# Altium PCB PCB.PcbDoc (part 1 of 5)
Units mm, origin at the board's own origin, x right, y up, seen from the top; angles counter-clockwise.
Board outline 101.6 x 53.34 mm, 6 copper layers (Top Layer, Int1 (GND), Int2, Int3, Int4 (GND), Bottom Layer), stack 1.625 mm thick; 228 components, 228 nets, 1016 pads, 995 vias.
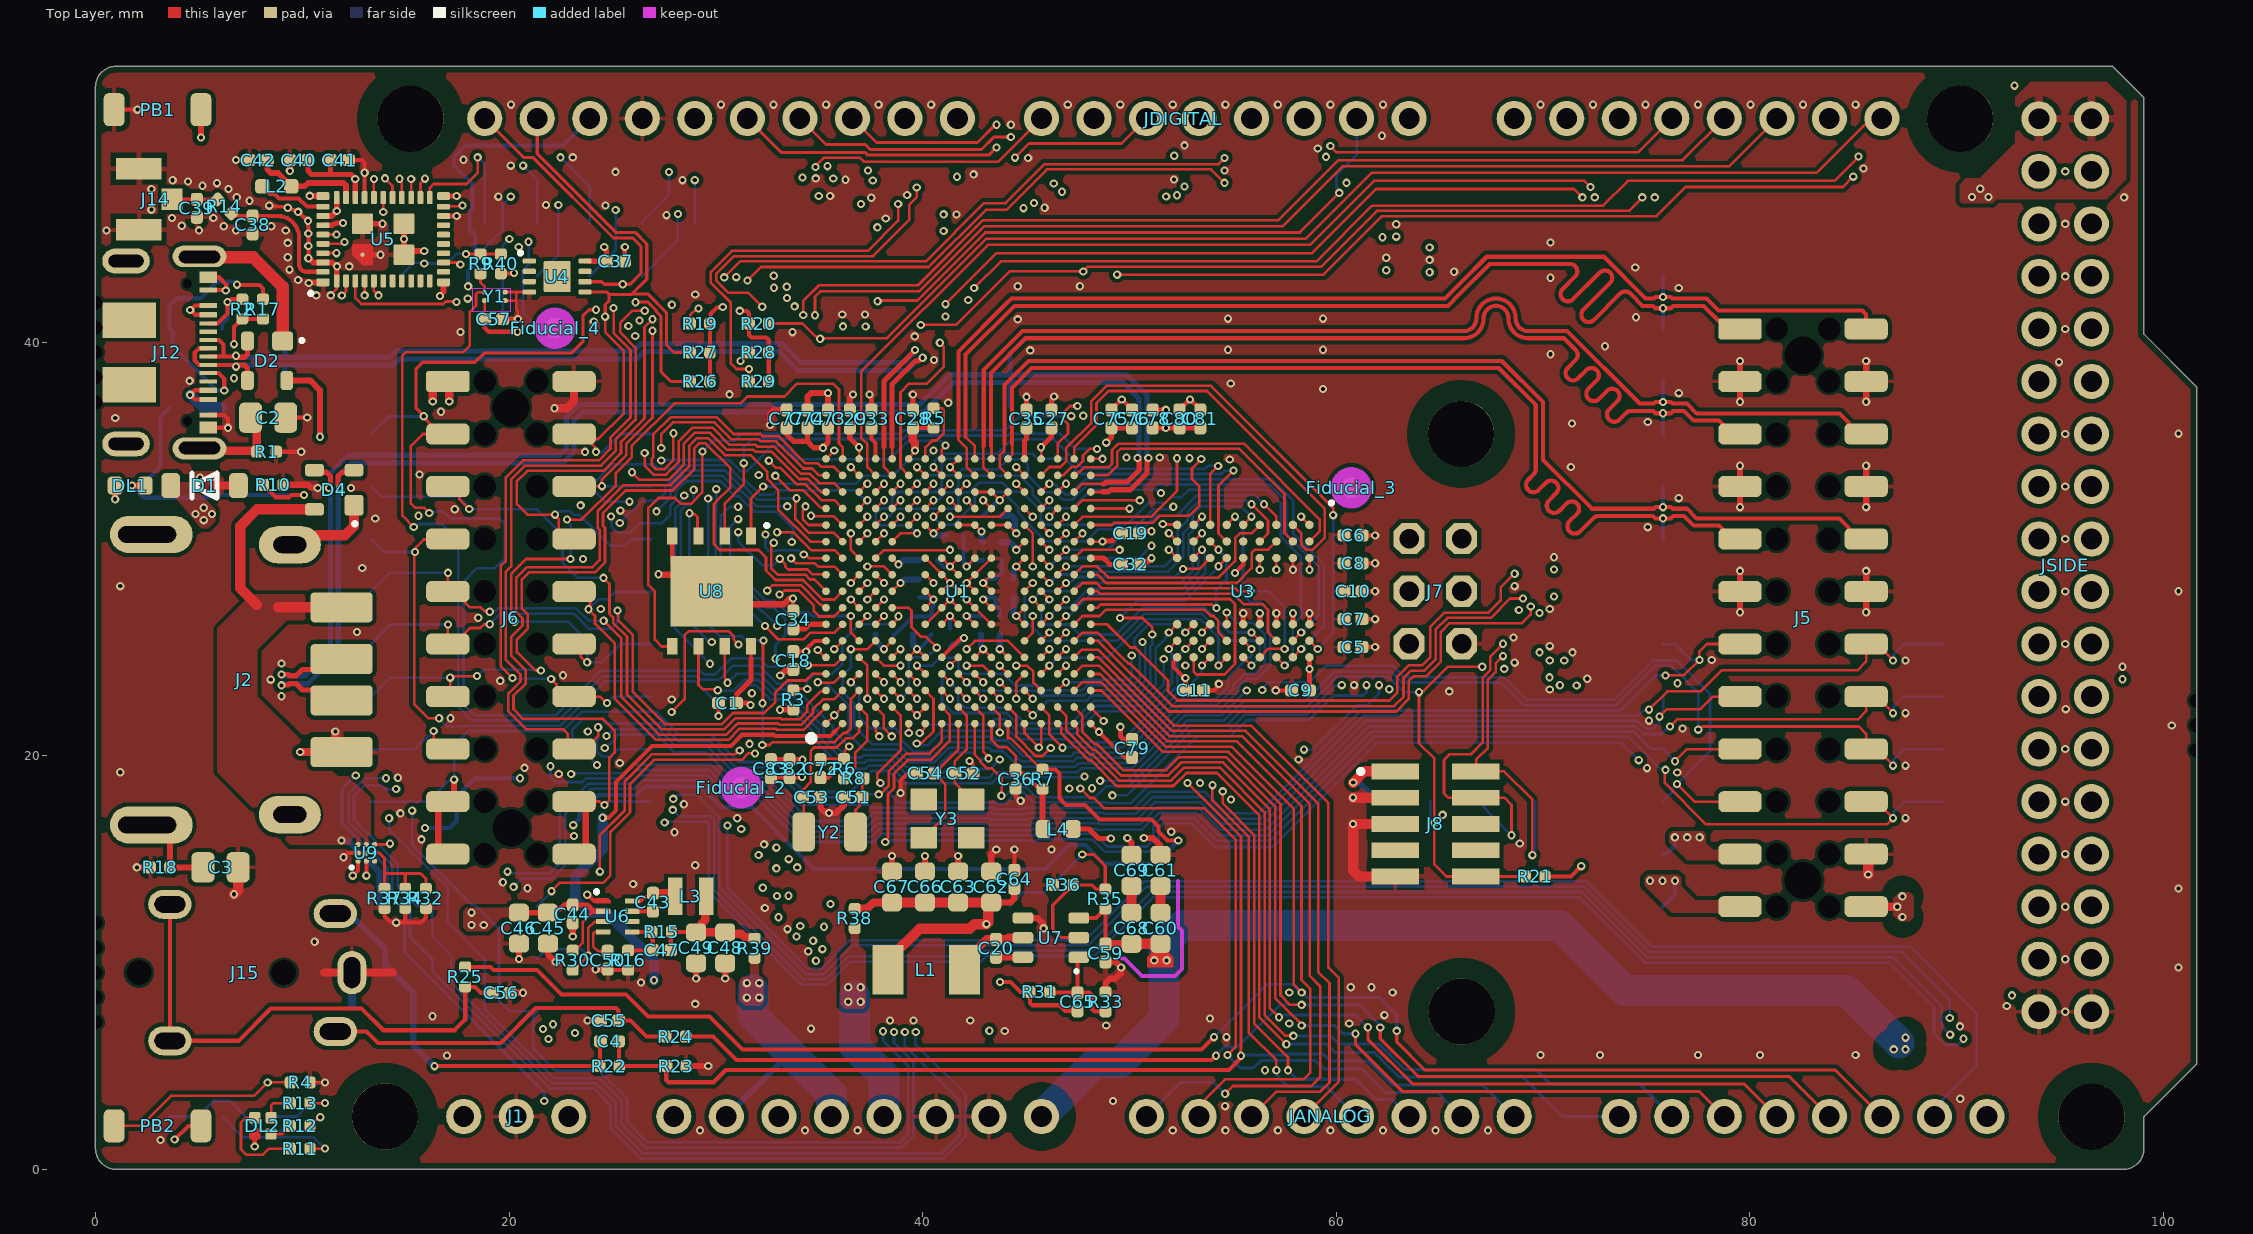
[diagram p0: Top Layer view]
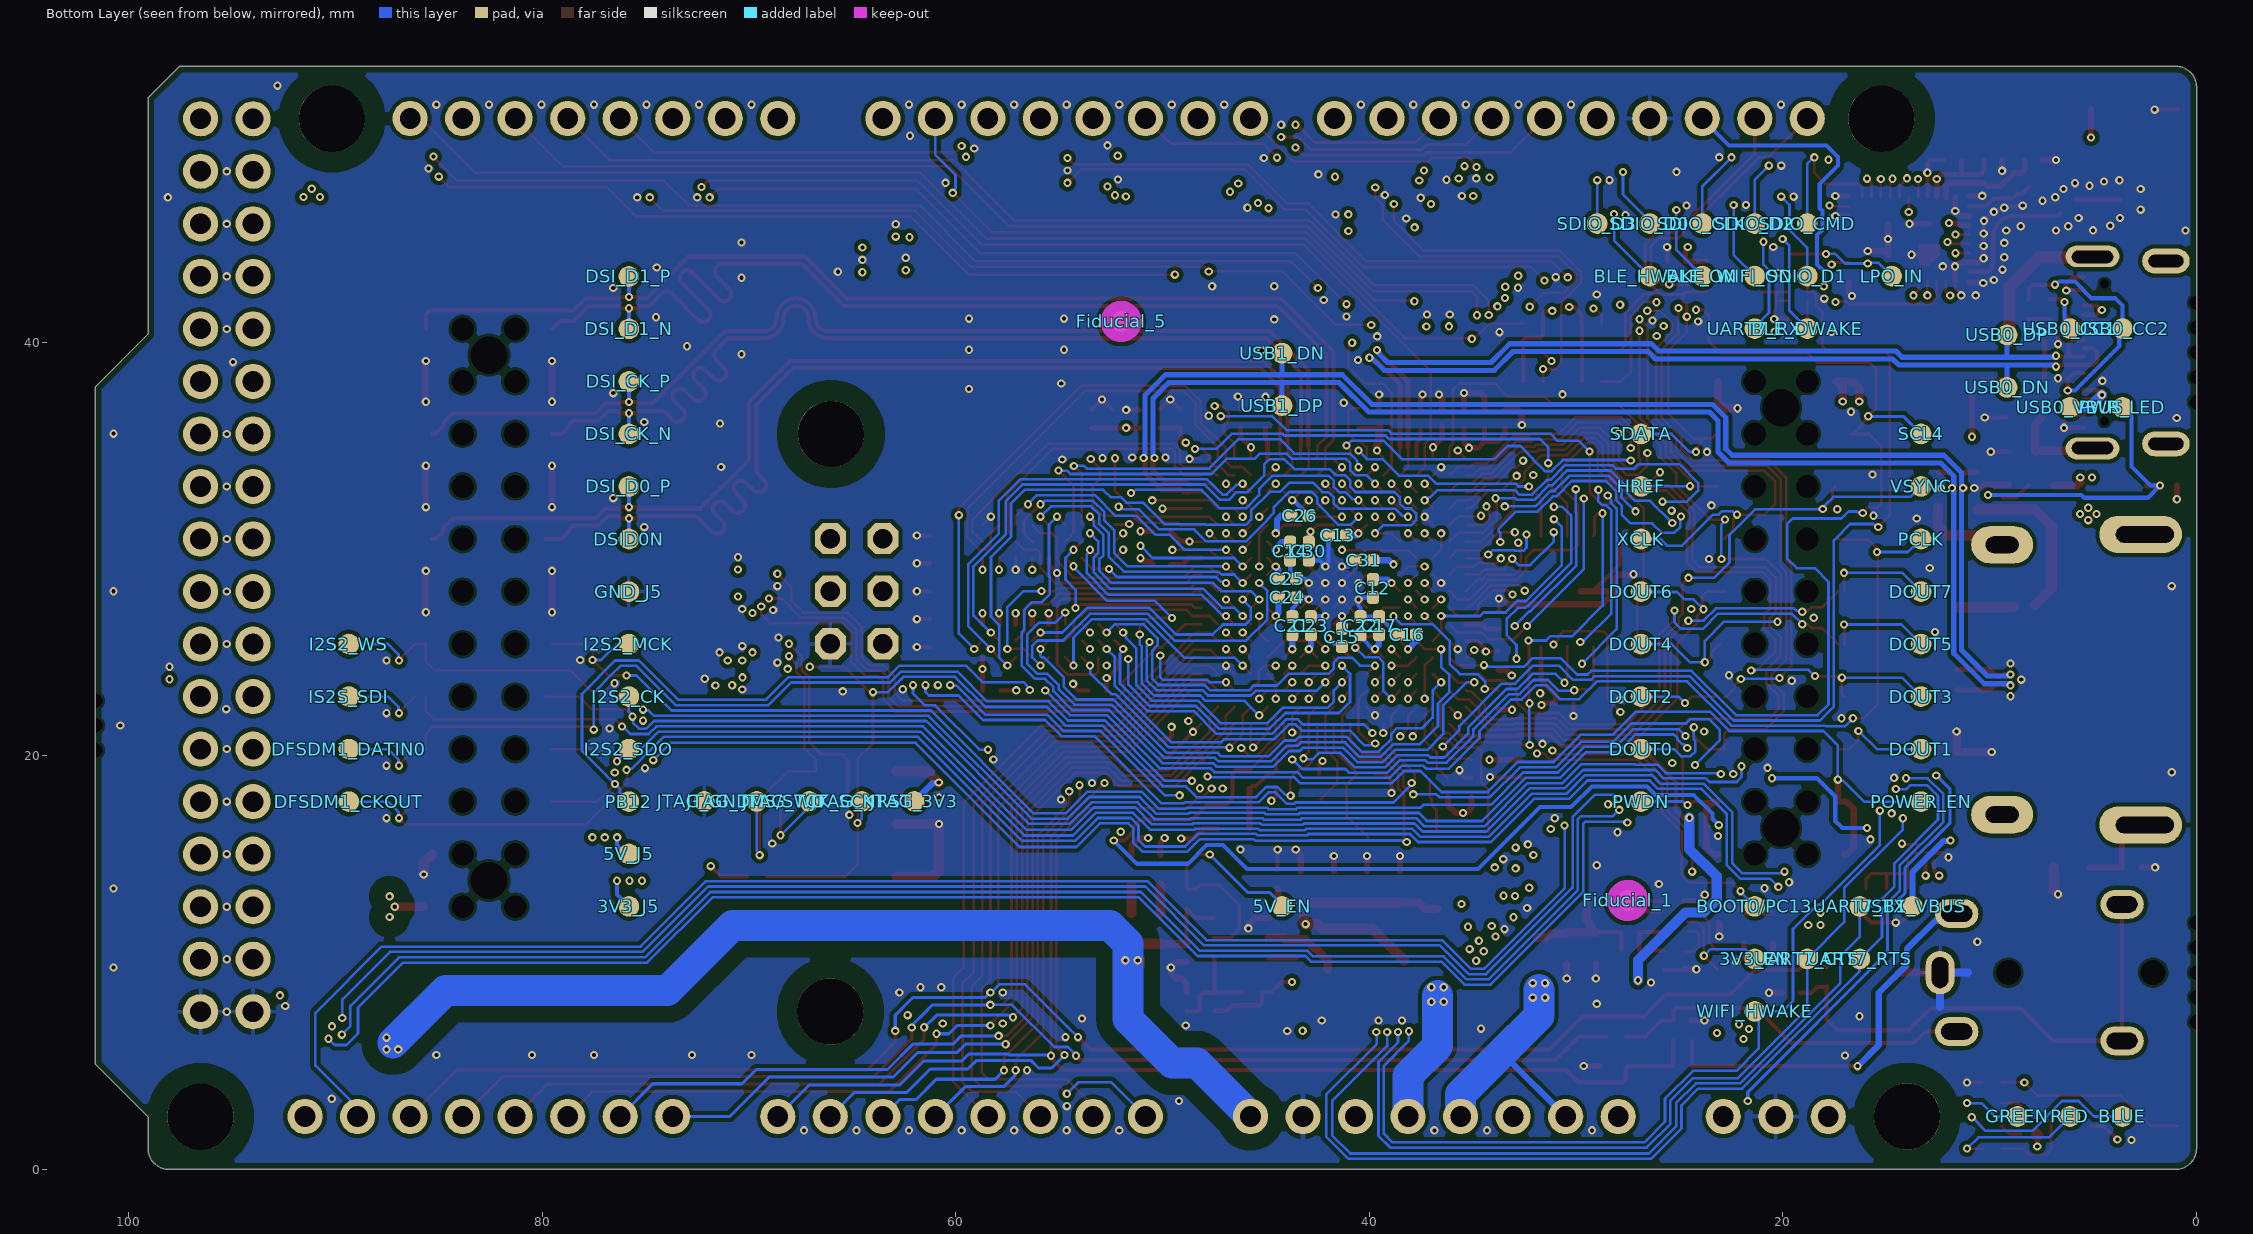
[diagram p1: Bottom Layer view, seen from below]
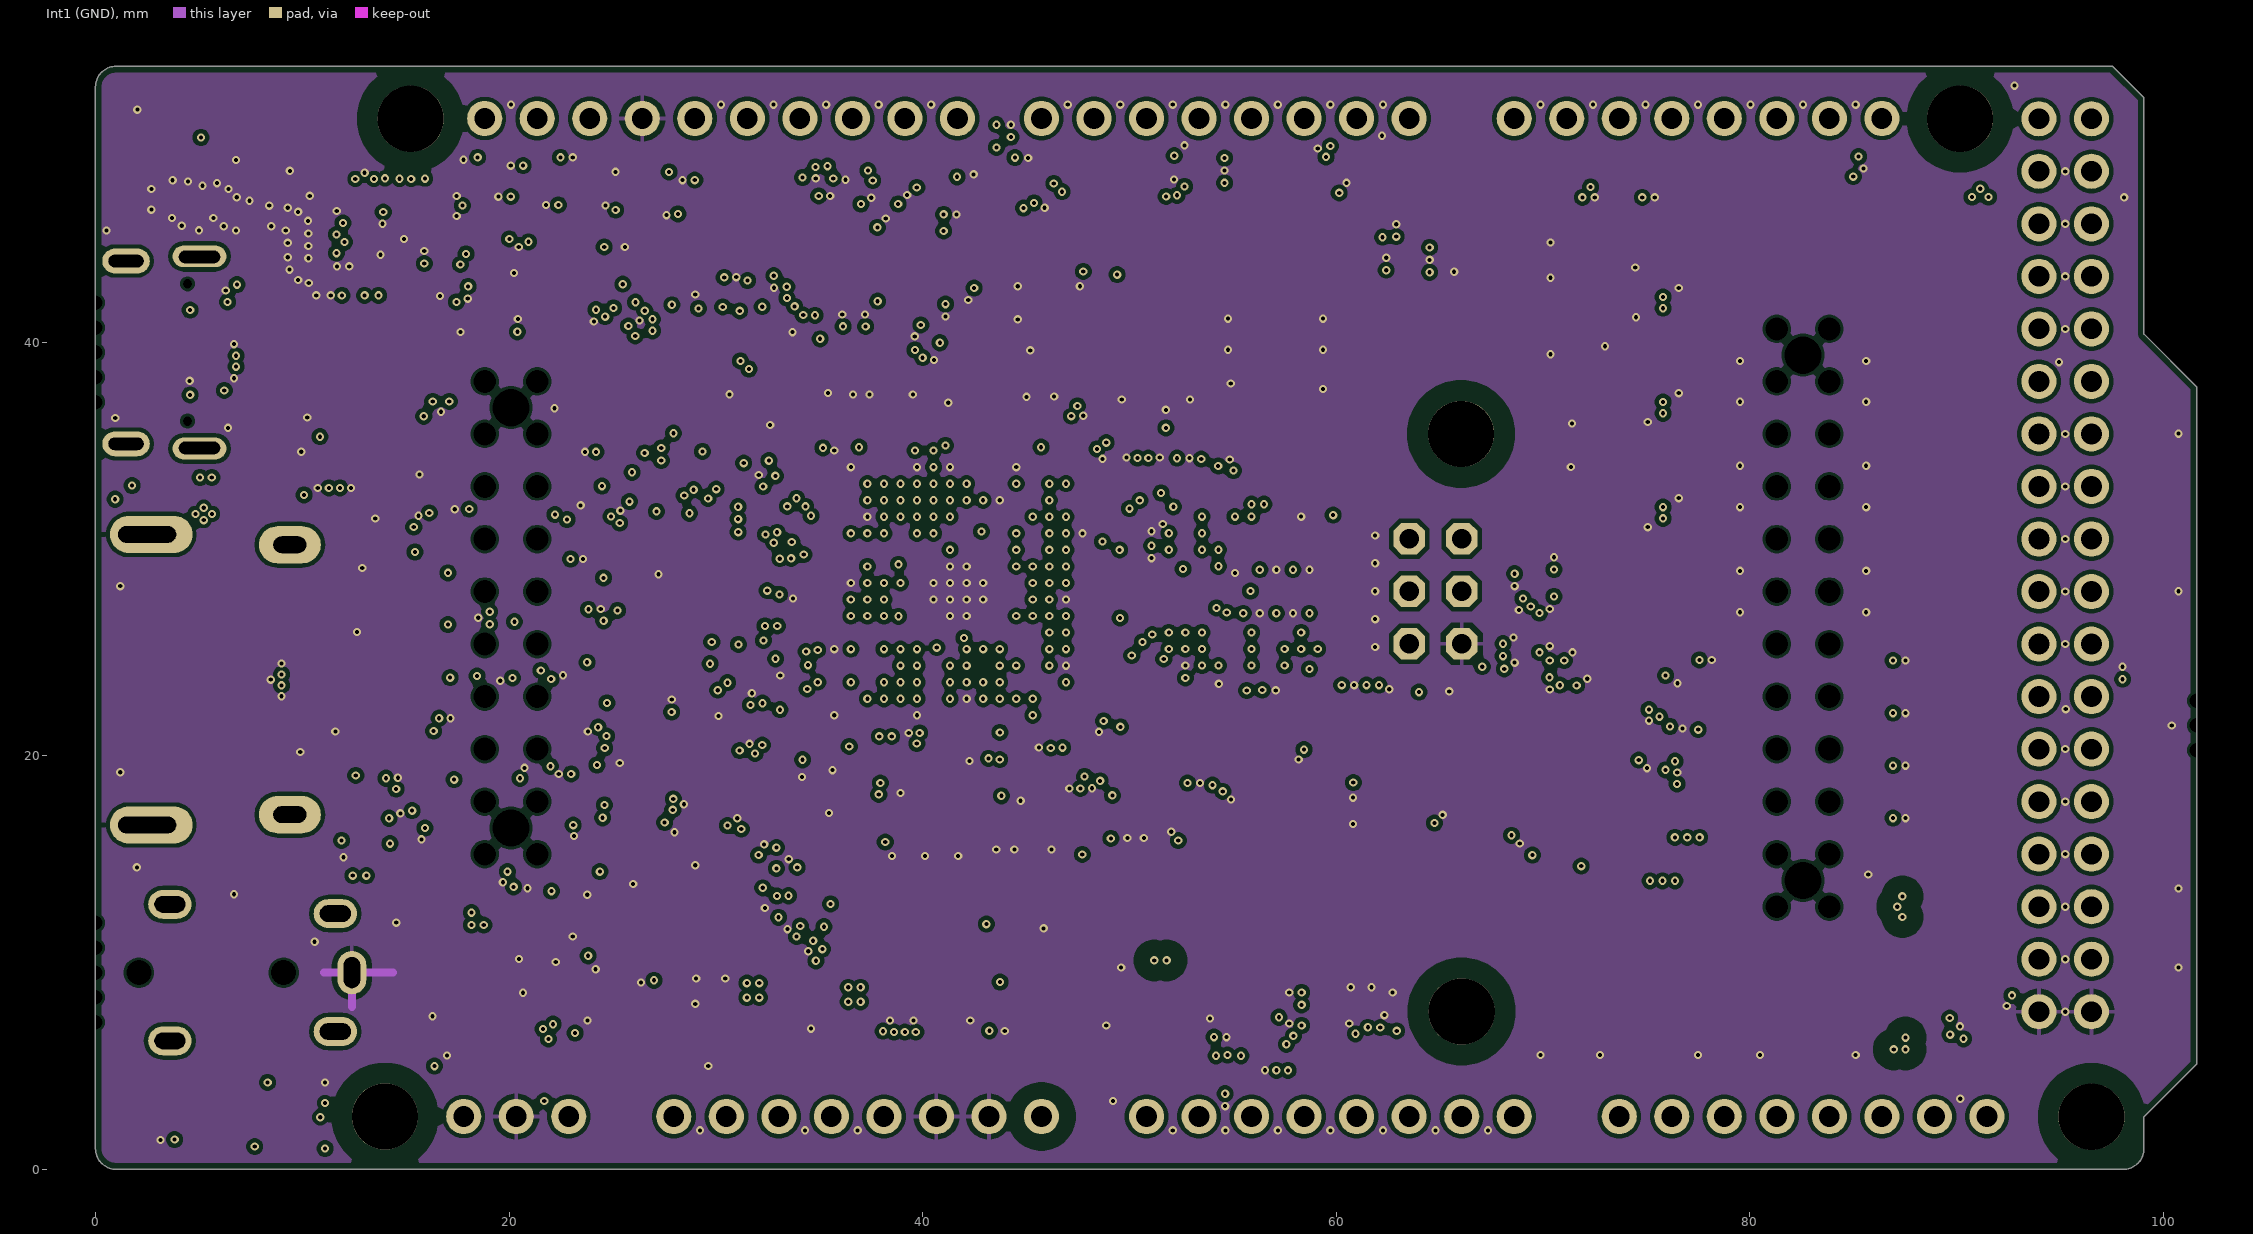
[diagram p2: Int1 (GND)]
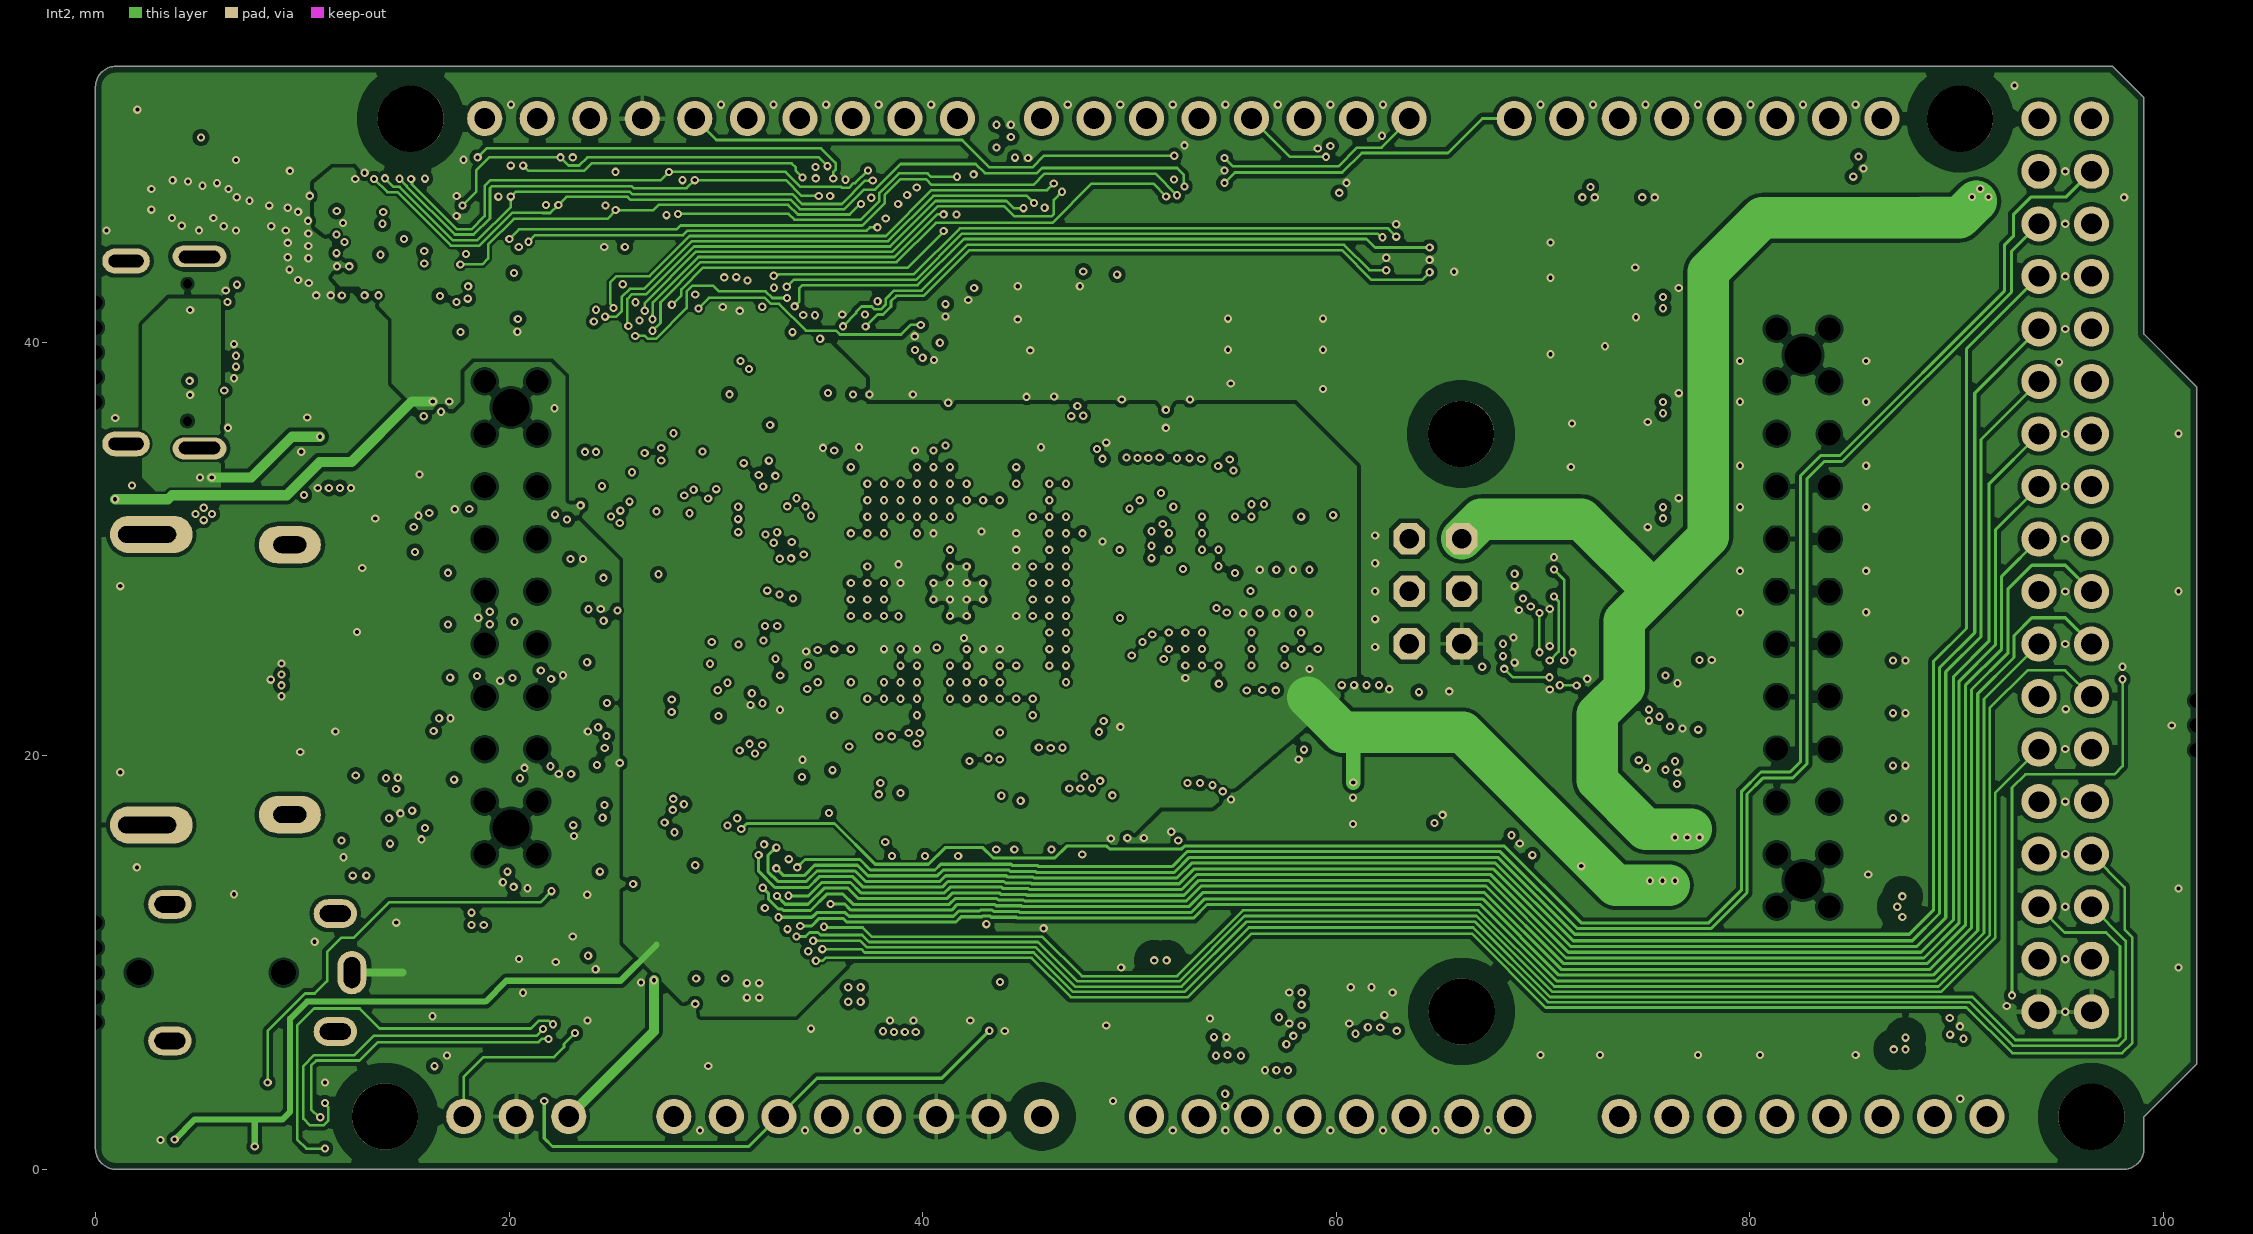
[diagram p3: Int2]
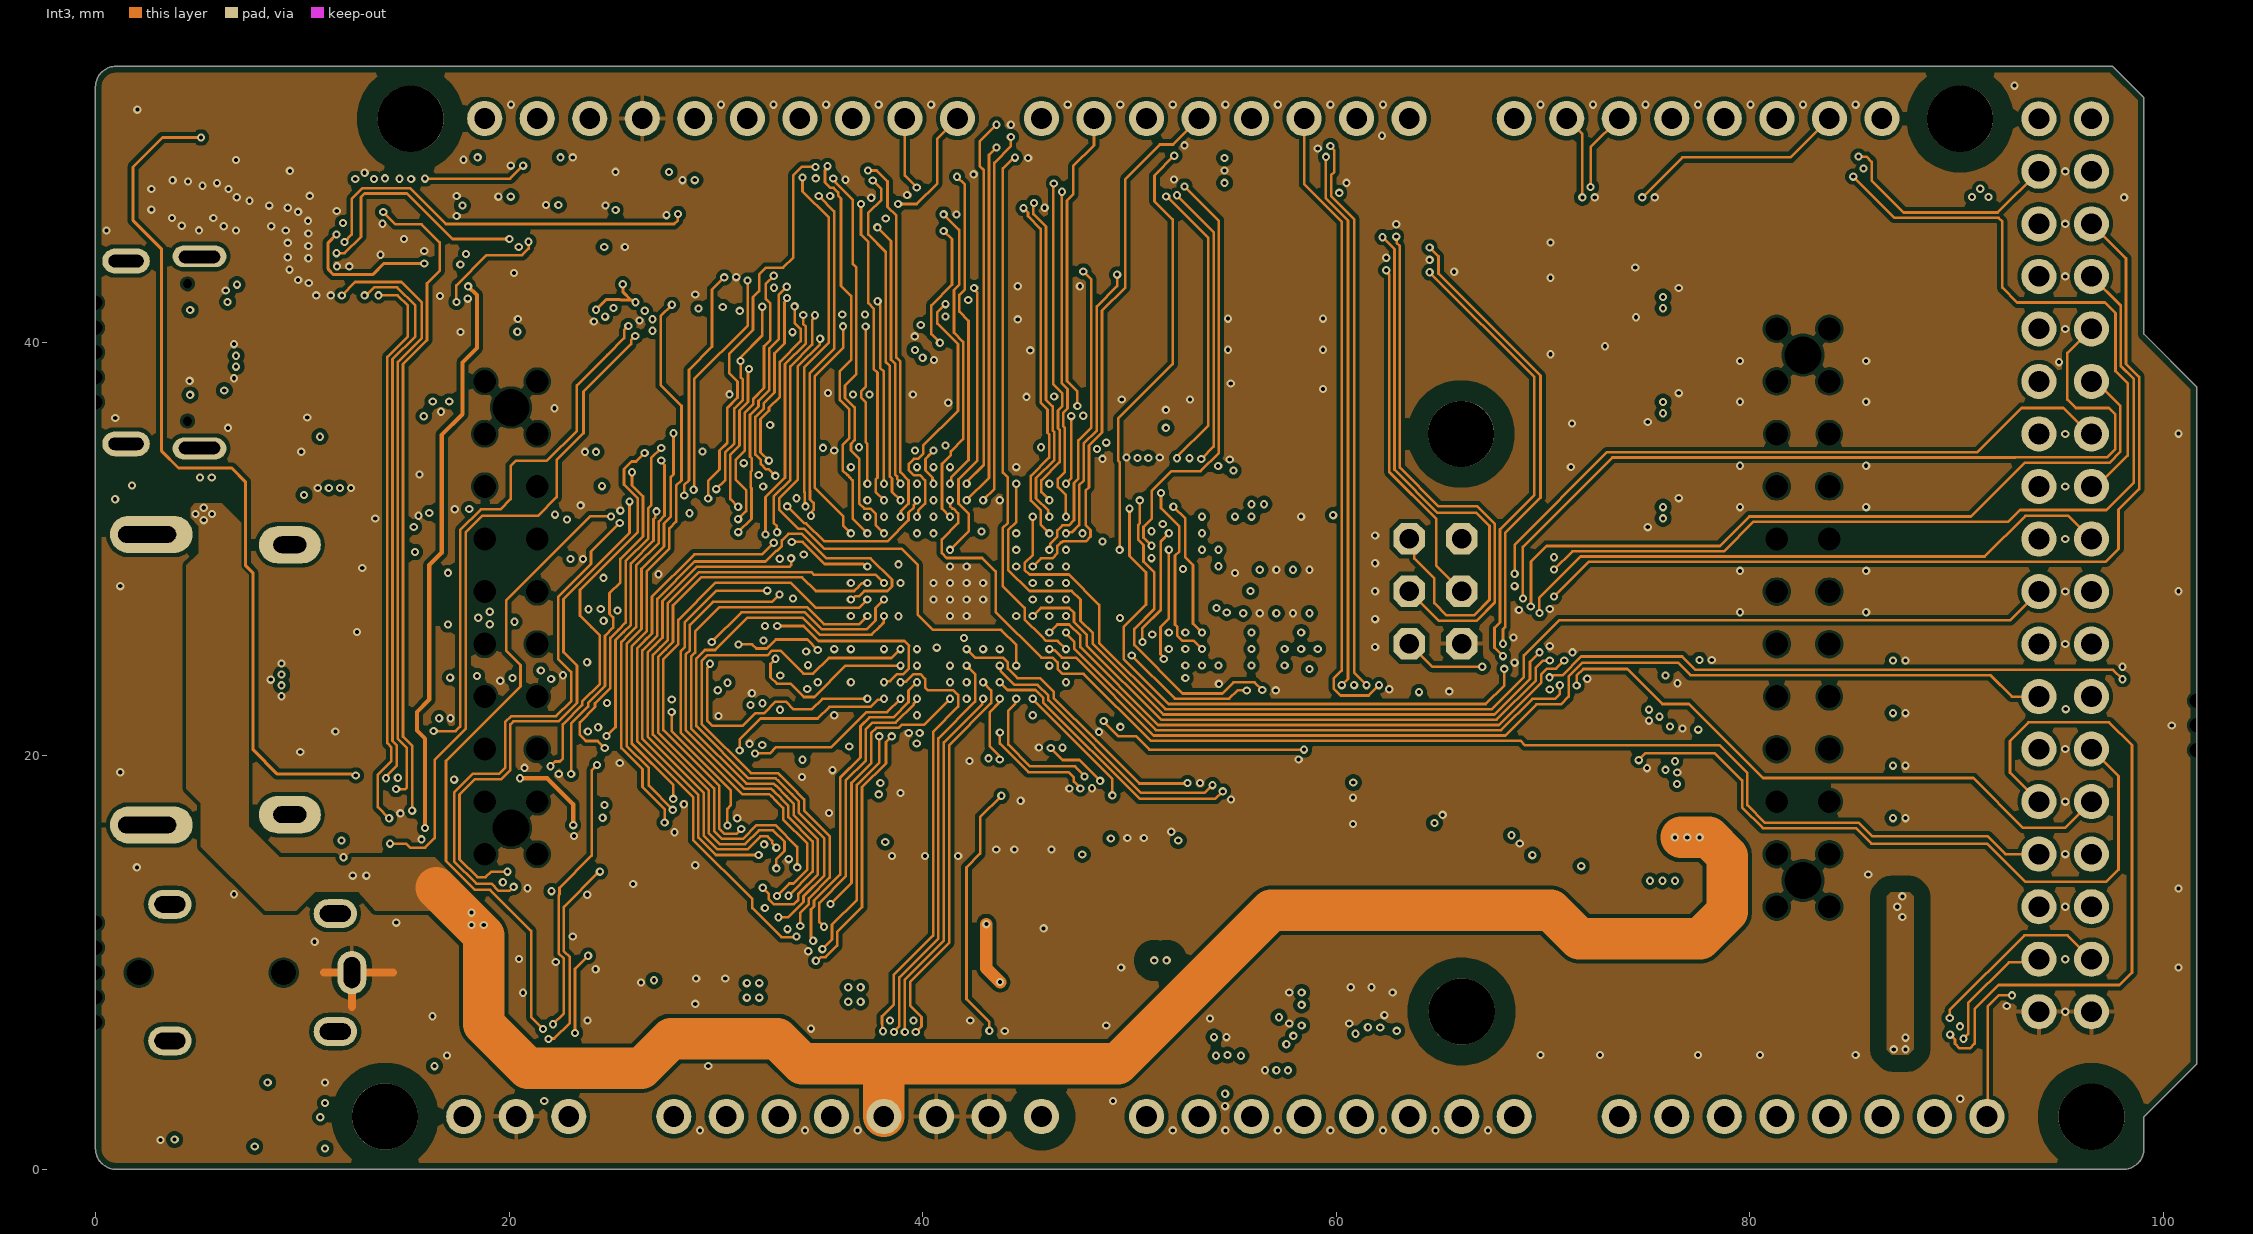
[diagram p4: Int3]
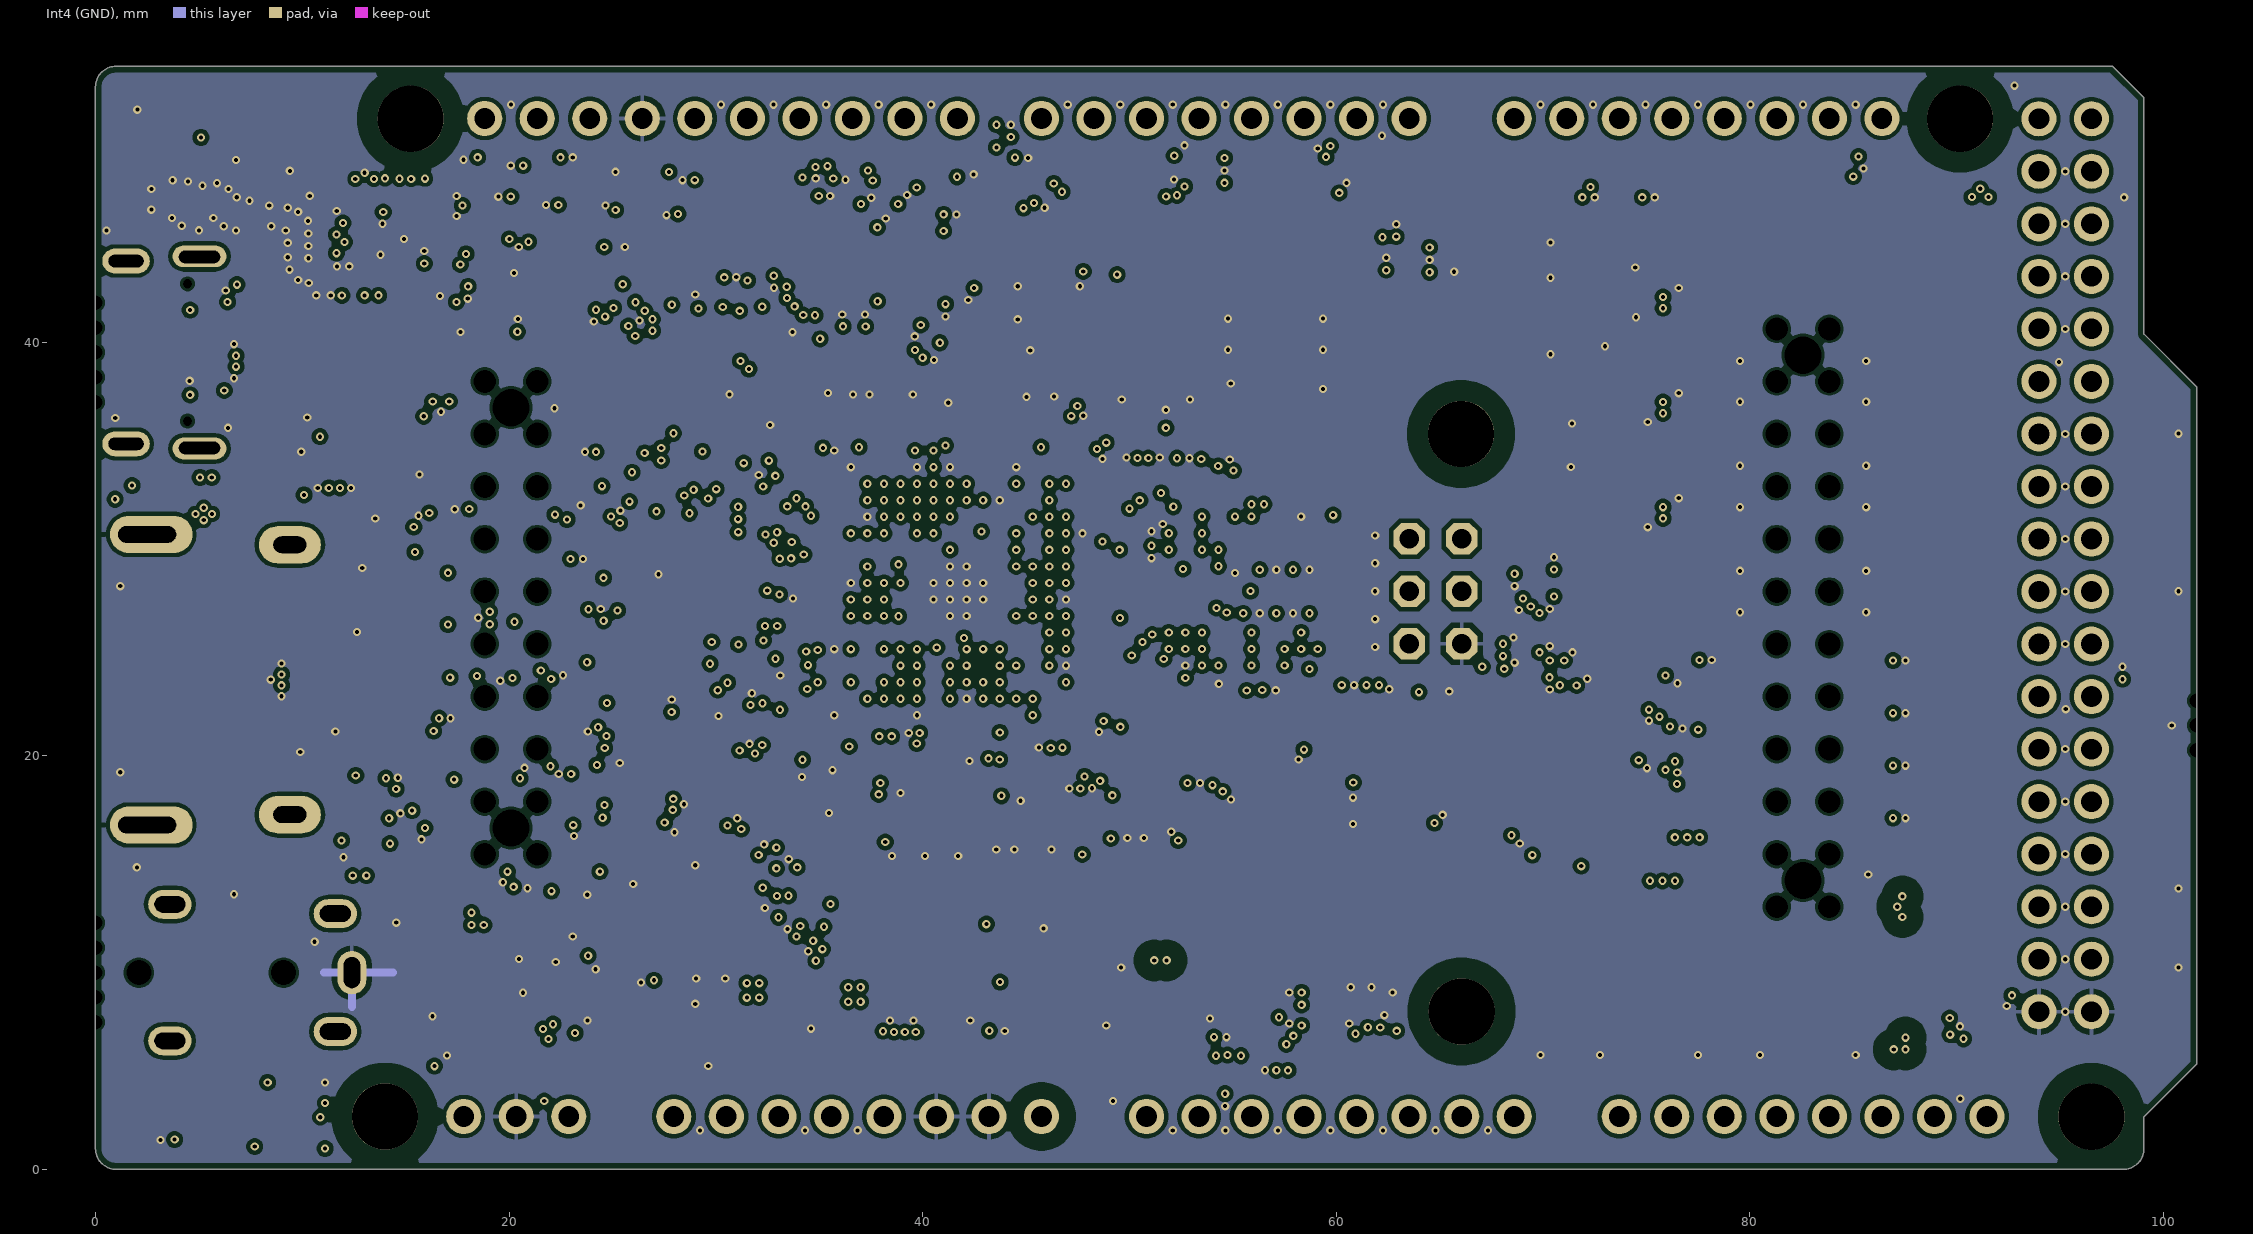
[diagram p5: Int4 (GND)]
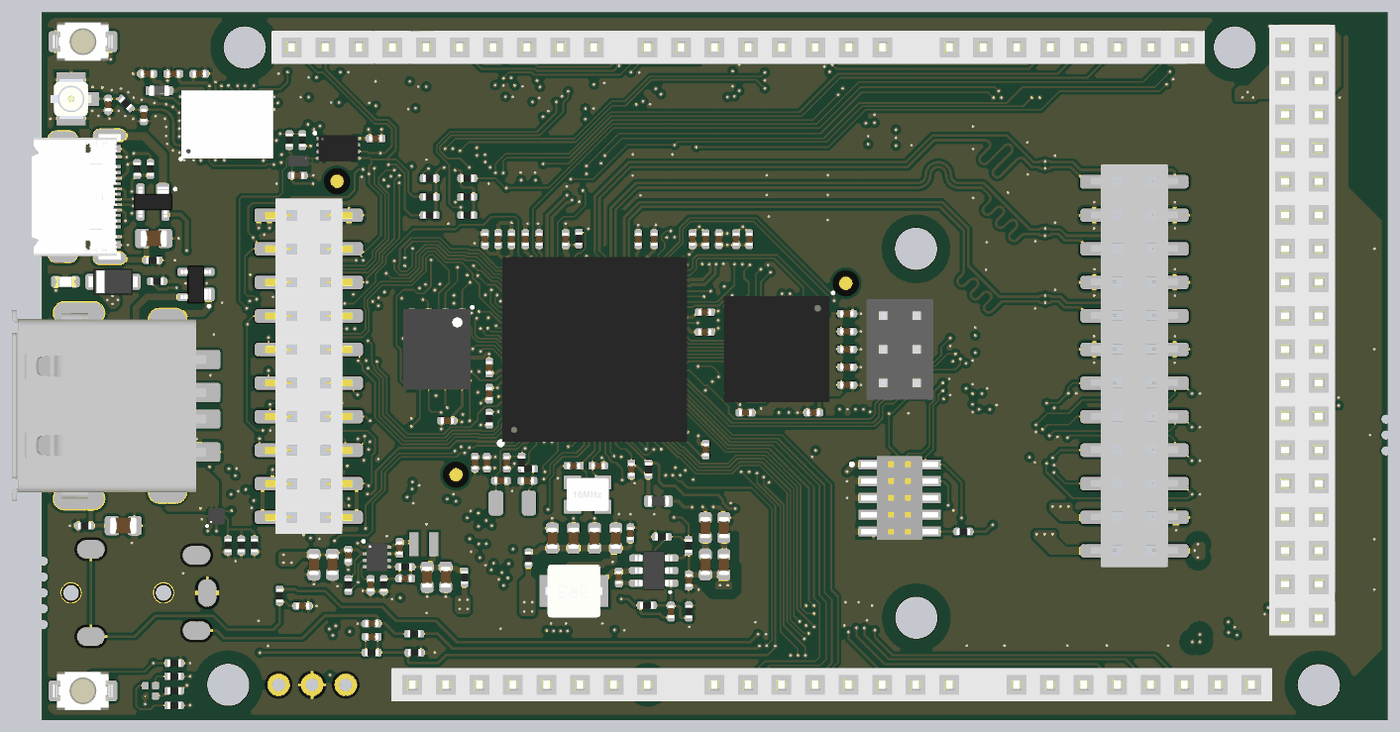
[diagram p10: 3D render of the assembled board from above, using the file's embedded part models]
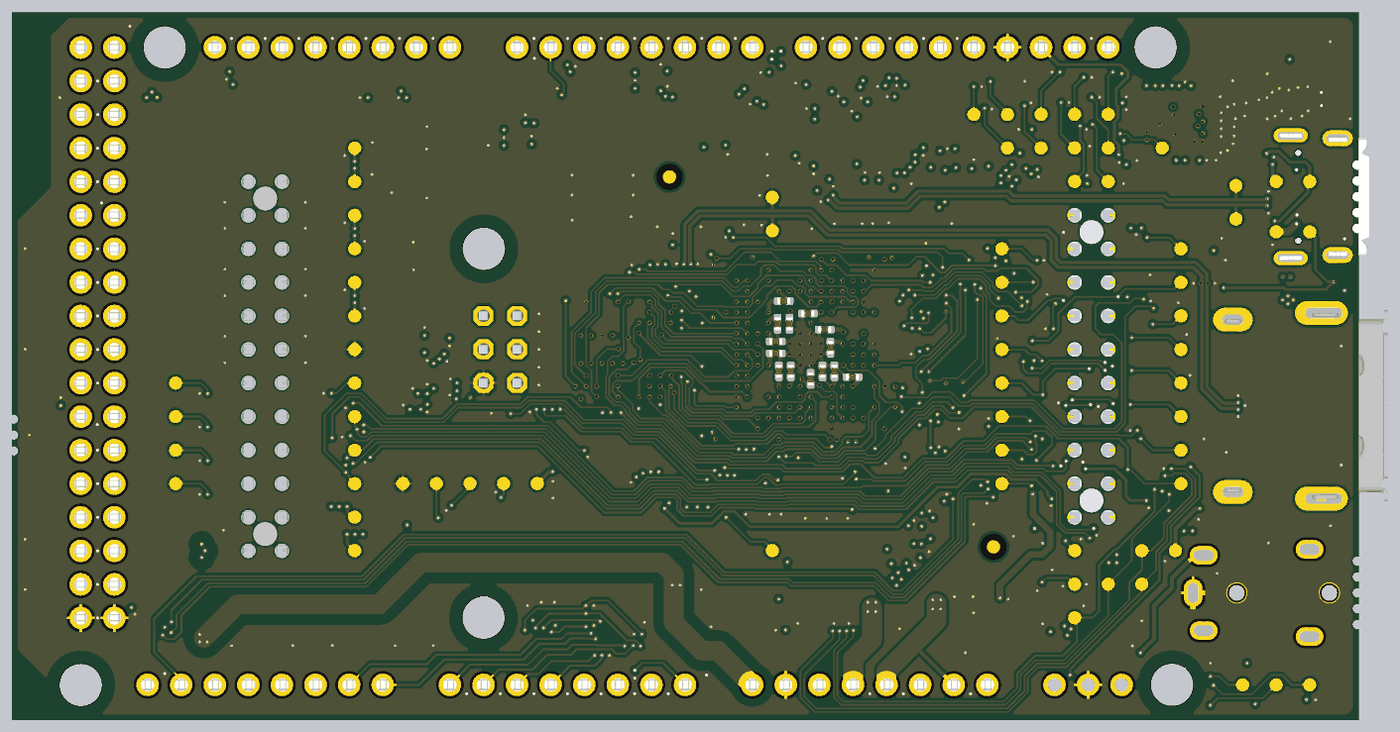
[diagram p11: 3D render of the assembled board from below, using the file's embedded part models]

## Layer stack, top to bottom
Top Solder: solder mask 0.0254, SM-003, Dk 4
Top Layer: signal copper 0.0175
Dielectric 1: prepreg 0.31, FR-4, Dk 4.3
Int1 (GND): signal copper 0.0175
Dielectric 2: core 0.33, PR1080, Dk 4.1
Int2: signal copper 0.0175
Dielectric 4: prepreg 0.24, FR-4, Dk 4.1
Int3: signal copper 0.0175
Dielectric 3: core 0.33, PR1080, Dk 4.1
Int4 (GND): signal copper 0.0175
Dielectric 5: prepreg 0.31, FR-4, Dk 4.3
Bottom Layer: signal copper 0.0175
Bottom Solder: solder mask 0.0254, SM-003, Dk 4

## Board outline
0,1 0,52.34 cw(c1,52.34) 1,53.34 97.536,53.34 99.06,51.816 99.06,40.386 101.6,37.846 101.6,5.08 99.06,2.54 99.06,1 cw(c98.06,1) 98.06,0 1,0 cw(c1,1)

## Design rules (kind name [scope] priority, off if disabled: settings)
BoardOutlineClearance MOUSEBITES [(ObjectKind = 'Pad') And (Name = 'Free-MOUSEBITE')] p1: gap=0 ignorepadtopadclearanceinfootprint=FALSE
BoardOutlineClearance Silks [(OnLayer('Top Overlay') OR OnLayer('Bottom Overlay'))] p2: gap=0 ignorepadtopadclearanceinfootprint=FALSE
BoardOutlineClearance [All] p3: gap=0.3 ignorepadtopadclearanceinfootprint=FALSE
Clearance mousebites_pol [All vs (ObjectKind = 'Pad') And (Name = 'Free-MOUSEBITE')] p1: gap=0.127 ignorepadtopadclearanceinfootprint=FALSE except(0.4: Arc-Fill Arc-Poly Arc-Region Track-Fill Track-Poly Track-Region SMDPad-Fill SMDPad-Poly SMDPad-Region THPad-Fill THPad-Poly THPad-Region Via-Fill Via-Poly Via-Region Fill-Fill Fill-Poly Fill-Region Poly-Poly Poly-Region Region-Region)
Clearance [(ObjectKind = 'Poly') And (Name = 'POWER_POLY')] p2: gap=0.5 ignorepadtopadclearanceinfootprint=TRUE
Clearance MH [(ObjectKind = 'Pad') And (Component = 'Free') And (Name = 'Free-MH')] p3: gap=1 ignorepadtopadclearanceinfootprint=FALSE
Clearance VIN40V_TOP [(InNet('VIN') AND OnLayer('Top Layer'))] p4: gap=0.2 ignorepadtopadclearanceinfootprint=TRUE
Clearance VIN40VnoPAD [(ObjectKind = 'Pad') And (Net = 'No Net') And (Component = 'J5') And (Name = 'J5-0') vs InNet('VIN')] p5: gap=0.127 ignorepadtopadclearanceinfootprint=TRUE
Clearance VIN40V [InNet('VIN')] p6: gap=0.25 ignorepadtopadclearanceinfootprint=TRUE except(0.15: Arc-SMDPad Track-SMDPad; 0.2: SMDPad-SMDPad; 0.6: SMDPad-Fill SMDPad-Poly SMDPad-Region; 0.8: Arc-Fill Arc-Poly Arc-Region Track-Fill Track-Poly Track-Region THPad-Fill THPad-Poly THPad-Region Via-Fill Via-Poly Via-Region Fill-Fill Fill-Poly Fill-Region Poly-Poly Poly-Region Region-Region)
Clearance GNDPOLYGONS [InNet('GND')] p7: gap=0.127 ignorepadtopadclearanceinfootprint=TRUE except(0.2: Arc-Fill Arc-Poly Arc-Region Track-Fill Track-Poly Track-Region SMDPad-Fill SMDPad-Poly SMDPad-Region THPad-Fill THPad-Poly THPad-Region Via-Fill Via-Poly Via-Region Fill-Fill Fill-Poly Fill-Region Poly-Poly Poly-Region Region-Region)
Clearance 3V3POLYGONS [(ObjectKind = 'Poly') And (Net = '+3V3')] p8: gap=0.3 ignorepadtopadclearanceinfootprint=FALSE
Clearance "Generic clearance 0.127mm" [All] p9: gap=0.127 ignorepadtopadclearanceinfootprint=FALSE
ComponentClearance Flash [HasFootprint('WSON8-1') vs HasFootprint('PSON127P600X60_HS-9N')] p1: gap=0 collisioncheckmode=3 verticalgap=0 showdistances=FALSE
ComponentClearance Fiducials [HasFootprint('Fiducial mark 1mm-Footprint-1')] p2: gap=0 collisioncheckmode=3 verticalgap=0.254 showdistances=FALSE
ComponentClearance 32k_R6R8 [InComponent('R6') vs InComponent('R8')] p3: gap=0 collisioncheckmode=3 verticalgap=0 showdistances=FALSE
ComponentClearance [All] p4: gap=0.2 collisioncheckmode=3 verticalgap=0 showdistances=TRUE
DiffPairsRouting [InDifferentialPairClass('DSI')] p1: maxlimit=2 minlimit=0.127 mostfreqgap=0.15 toplayer_minwidth=0.127 toplayer_maxwidth=0.2 toplayer_prefwidth=0.2 midlayer1_mingap=0.15 midlayer1_maxgap=0.15 midlayer1_minwidth=0.127 midlayer1_maxwidth=0.127 midlayer1_prefwidth=0.127 midlayer2_mingap=0.15 midlayer2_maxgap=0.15 midlayer2_minwidth=0.127 midlayer2_maxwidth=0.127 midlayer2_prefwidth=0.127 midlayer3_mingap=0.15 midlayer3_maxgap=0.15 midlayer3_minwidth=0.127 midlayer3_maxwidth=0.127 midlayer3_prefwidth=0.127 midlayer4_mingap=0.15 midlayer4_maxgap=0.15 midlayer4_minwidth=0.127 midlayer4_maxwidth=0.127 midlayer4_prefwidth=0.127 bottomlayer_maxgap=0.15 bottomlayer_minwidth=0.127 bottomlayer_maxwidth=0.2 bottomlayer_prefwidth=0.2 impedanceprofiledriven=TRUE impedanceprofileid={AD32D083-2DFB-4891-9FE5-643CC1F7C203} impedanceprofilevalue=100.000000 maxuncoupledlength=12.7
DiffPairsRouting USB [InDifferentialPairClass('USB')] p2: maxlimit=0.15 minlimit=0.127 mostfreqgap=0.15 toplayer_maxgap=0.127 toplayer_prefgap=0.127 toplayer_minwidth=0.127 toplayer_maxwidth=0.25 toplayer_prefwidth=0.25 midlayer1_minwidth=0.15 midlayer1_maxwidth=0.15 midlayer1_prefwidth=0.15 midlayer2_minwidth=0.15 midlayer2_maxwidth=0.15 midlayer2_prefwidth=0.15 midlayer3_minwidth=0.15 midlayer3_maxwidth=0.15 midlayer3_prefwidth=0.15 midlayer4_minwidth=0.15 midlayer4_maxwidth=0.15 midlayer4_prefwidth=0.15 bottomlayer_maxgap=0.127 bottomlayer_prefgap=0.127 bottomlayer_minwidth=0.127 bottomlayer_maxwidth=0.25 bottomlayer_prefwidth=0.25 impedanceprofiledriven=TRUE impedanceprofileid={586DF874-F34C-49A6-9A09-DEFA45723978} impedanceprofilevalue=90.000000 maxuncoupledlength=12.7
Height [All] p1: minheight=0 maxheight=30 prefheight=12.7
HoleSize [All] p1: absolutevalues=TRUE maxlimit=20 minlimit=0.2 maxpercent=80.000 minpercent=20.000
HoleToHoleClearance HoleToHoleClearance_1 [HasFootprint('CX90B1-24P') vs HasFootprint('CX90B1-24P')] p1: gap=0 allowstackedmicrovias=TRUE
HoleToHoleClearance [All] p2: gap=0.25 allowstackedmicrovias=FALSE
MatchedLengths MatchedLengths_1 [InDifferentialPairClass('DSI')] p1: tolerance=25.4 checknetsindiffpair=TRUE checkdiffpairvsdiffpair=FALSE checkxsignals=FALSE checkothers=FALSE usedelayunits=TRUE delaytolerance=12.000000
MatchedLengths [InDifferentialPairClass('DSI')] p2: tolerance=25.4 checknetsindiffpair=FALSE checkdiffpairvsdiffpair=TRUE checkxsignals=TRUE checkothers=TRUE usedelayunits=TRUE delaytolerance=25.000000
PlaneConnect [All] p1: pad.planeconnectstyle=Relief pad.reliefexpansion=0.508 pad.reliefentries=4 pad.reliefconductorwidth=0.254 pad.reliefairgap=0.254 via.planeconnectstyle=Direct via.reliefexpansion=0.508 via.reliefentries=4 via.reliefconductorwidth=0.254 via.reliefairgap=0.254
PolygonConnect 3V3_FLASH [All vs (ObjectKind = 'Poly') And (Net = '+3V3') And (Name = '+3V3_FLASH')] p1: thpad.connectstyle=Direct thpad.reliefconductorwidth=0.254 thpad.reliefentries=4 thpad.polygonreliefangle="90 Angle" thpad.airgapwidth=0.254 smdpad.connectstyle=Relief smdpad.reliefconductorwidth=0.15 smdpad.reliefentries=4 smdpad.polygonreliefangle="90 Angle" smdpad.airgapwidth=0.15 via.connectstyle=Direct via.reliefconductorwidth=0.254 via.reliefentries=4 via.polygonreliefangle="90 Angle" via.airgapwidth=0.254
PolygonConnect 5VTOP [InNet('+5V')] p2: thpad.connectstyle=Relief thpad.reliefconductorwidth=0.4 thpad.reliefentries=4 thpad.polygonreliefangle="90 Angle" thpad.airgapwidth=0.254 smdpad.connectstyle=Direct smdpad.reliefconductorwidth=0.254 smdpad.reliefentries=4 smdpad.polygonreliefangle="90 Angle" smdpad.airgapwidth=0.254 via.connectstyle=Direct via.reliefconductorwidth=0.254 via.reliefentries=4 via.polygonreliefangle="90 Angle" via.airgapwidth=0.254
PolygonConnect 3V3TOP [InNet('+3V3')] p3: thpad.connectstyle=Relief thpad.reliefconductorwidth=0.4 thpad.reliefentries=4 thpad.polygonreliefangle="90 Angle" thpad.airgapwidth=0.254 smdpad.connectstyle=Direct smdpad.reliefconductorwidth=0.254 smdpad.reliefentries=4 smdpad.polygonreliefangle="90 Angle" smdpad.airgapwidth=0.254 via.connectstyle=Direct via.reliefconductorwidth=0.254 via.reliefentries=4 via.polygonreliefangle="90 Angle" via.airgapwidth=0.254
PolygonConnect [All] p4: thpad.connectstyle=Relief thpad.reliefconductorwidth=0.2 thpad.reliefentries=4 thpad.polygonreliefangle="90 Angle" thpad.airgapwidth=0.254 smdpad.connectstyle=Relief smdpad.reliefconductorwidth=0.2 smdpad.reliefentries=4 smdpad.polygonreliefangle="90 Angle" smdpad.airgapwidth=0.254 via.connectstyle=Direct via.reliefconductorwidth=0.254 via.reliefentries=4 via.polygonreliefangle="90 Angle" via.airgapwidth=0.254
RoomDefinition STM32H747 [InComponentClass('STM32H747')] p1: confinementstyle=ConfineIn formatcopy=TRUE lockcomponents=FALSE outline -40.4,-40.4 10.4,-40.4 10.4,-15 -40.4,-15
RoomDefinition HEADERS [InComponentClass('HEADERS')] p2: confinementstyle=ConfineIn formatcopy=TRUE lockcomponents=FALSE outline 101.84,2.78 109.46,2.78 109.46,15.48 101.84,15.48
RoomDefinition CRYPTOCHIP [InComponentClass('CRYPTOCHIP')] p3: confinementstyle=ConfineIn formatcopy=TRUE lockcomponents=FALSE outline -40.4,-40.4 10.4,-40.4 10.4,-15 -40.4,-15
RoomDefinition U_USB [InComponentClass('U_USB')] p4: confinementstyle=ConfineIn formatcopy=TRUE lockcomponents=FALSE outline -40.4,-40.4 10.4,-40.4 10.4,-15 -40.4,-15
RoomDefinition WIFI [InComponentClass('WIFI')] p5: confinementstyle=ConfineIn formatcopy=TRUE lockcomponents=FALSE outline -40.4,-40.4 10.4,-40.4 10.4,-15 -40.4,-15
RoomDefinition U_AUDIO [InComponentClass('U_AUDIO')] p6: confinementstyle=ConfineIn formatcopy=TRUE lockcomponents=FALSE outline -40.4,-40.4 10.4,-40.4 10.4,-15 -40.4,-15
RoomDefinition U_POWER [InComponentClass('U_POWER')] p7: confinementstyle=ConfineIn formatcopy=TRUE lockcomponents=FALSE outline 57.6,-10.4 61.6,-10.4 61.6,-6.4 57.6,-6.4
RoomDefinition TOP [InComponentClass('TOP')] p8: confinementstyle=ConfineIn formatcopy=TRUE lockcomponents=FALSE outline 102.7,1.5 112.4,1.5 112.4,12.5 102.7,12.5
RoutingVias TOPBOTTOM [InDrillLayerPair('Top Layer - Bottom Layer')] p1: holewidth=0.2 width=0.4 viastyle="Through Hole" minholewidth=0.2 minwidth=0.4 maxholewidth=0.2 maxwidth=0.4
ShortCircuit ShortCircuit_1 [(ObjectKind = 'Pad') And (Name = 'J12-FIXING') vs (ObjectKind = 'Pad') And (Name = 'Free-MOUSEBITE')] p1: allowed=TRUE
ShortCircuit [All] p2: allowed=FALSE
SilkToSilkClearance [All] p1: silktosilkclearance=0.2
SilkToSolderMaskClearance [IsPad] p1: minsilkscreentomaskgap=0.15 clearancetoexposedcopper=TRUE
SolderMaskExpansion VIAtented [IsVia] p1: expansion=0.102 istentingtop=TRUE
SolderMaskExpansion [All] p2: expansion=0.05 istentingtop=FALSE
UnRoutedNet [All] p1: checkbadconnections=TRUE
ViasUnderSMD [All] p1: allowed=FALSE
Width 50ohm [InNetClass('50 ohm')] p1: maxlimit=0.254 minlimit=0.2 preferedwidth=0.254 toplayer_maxwidth=0.2 toplayer_prefwidth=0.2 bottomlayer_maxwidth=0.2 bottomlayer_prefwidth=0.2 impedanceprofiledriven=TRUE impedanceprofileid={CBBC4A3A-112E-4A5A-AB75-891062E67277} impedanceprofilevalue=50.000000 minimp=50.000000 maximp=50.000000 favimp=50.000000
Width StandardTraces [All] p2: maxlimit=5 minlimit=0.127 preferedwidth=0.15
20 further rules are at their usual default settings.

## Classes and differential pairs
net class GND: GND
net class LTDC: PE6 PG10 PG12 PG13 PH15 PI10 PI11 PI13 PI14 PI15 PJ0 PJ1 PJ2 PJ3 PJ4 PJ5 PJ6 PJ7 PJ12 PJ14 PJ15 PK0 PK2 PK3 PK4 PK5 PK6 PK7
net class FLASH: PD11_5 PD12_5 PE2_5 PF6_5 PF10_5 PG6_5
net class ANALOG: LEFT MIC PA0_C PA1_C PA4 PB0 PB1 PC0 PC2 PC2_C PC3 PC3_C PC4 PC5
net class RAM: PD0_5 PD1_5 PD8_5 PD9_5 PD10_5 PD14_5 PD15_5 PE0_5 PE1_5 PE7_5 PE8_5 PE9_5 PE10_5 PE11_5 PE12_5 PE13_5 PE14_5 PE15_5 PF0_5 PF1_5 PF2_5 PF3_5 PF4_5 PF5_5 PF11_5 PF12_5 PF13_5 PF14_5 PF15_5 PG0_5 PG1_5 PG2_5 PG4_5 PG5_5 PG8_5 PG15_5 PH2_5 PH3_5 PH5_5
differential pair class DSI: DSI_CK DSI_D0 DSI_D1
differential pair class USB: USB0_D USB1_D
component class U_USB: C2 C3 D1 D2 D4 J2 J12 R1 R2 R17 R18 R32 R34 R37 U9 USB0_CC1 USB0_CC2 USB0_DN USB0_DP USB0_VBUS USB1_DN USB1_DP USB1_VBUS
component class STM32H747: C1 C5 C6 C7 C8 C9 C10 C11 C12 C13 C14 C15 C16 C17 C18 C19 C21 C22 C23 C24 C25 C26 C27 C28 C29 C30 C31 C32 C33 C34 C35 C36 C51 C52 C53 C54 C57 C72 C73 C74 C75 C76 C77 C78 C79 C80 C81 C82 C83 L4 R3 R4 R5 R6 R7 R8 R19 R20 R21 R26 R27 R28 R29 U1 U3 U8 Y1 Y2 Y3
component class U_POWER: 3V3_EN 5V_EN C20 C43 C44 C45 C46 C47 C48 C49 C50 C59 C60 C61 C62 C63 C64 C65 C66 C67 C68 C69 L1 L3 R15 R16 R30 R31 R33 R35 R36 R38 R39 U6 U7
component class HEADERS: 3V3_J5 5V_J5 DFSDM1_CKOUT DFSDM1_DATIN0 DOUT0 DOUT1 DOUT2 DOUT3 DOUT4 DOUT5 DOUT6 DOUT7 DSI_CK_N DSI_CK_P DSI_D0_P DSI_D1_N DSI_D1_P DSID0N GND_J5 HREF I2S2_CK I2S2_MCK I2S2_SDO I2S2_WS IS2S_SDI J1 J5 J6 J7 J8 JANALOG JDIGITAL JSIDE JTAG_3V3 JTAG_GND JTAG_NRST JTAG_TCK_SCK JTAG_TMS/SWD PB12 PCLK POWER_EN PWDN SCL4 SDATA VSYNC XCLK
component class U_AUDIO: C4 C55 C56 J15 R22 R23 R24 R25
component class CRYPTOCHIP: C37 U4
net class "50 ohm": NetC38_1 NetC39_1
component class WIFI: BLE_DWAKE BLE_HWAKE BLE_ON C38 C39 C40 C41 C42 J14 L2 LPO_IN R9 R14 R40 SDIO_CLK SDIO_CMD SDIO_D0 SDIO_D1 SDIO_D2 SDIO_D3 U5 UART7_CTS UART7_RTS UART7_RX UART7_TX WIFI_HWAKE WIFI_ON
component class TOP: BLUE BOOT0/PC13 DL1 DL2 Fiducial_1 Fiducial_2 Fiducial_3 Fiducial_4 Fiducial_5 GREEN PB1 PB2 PWR_LED R10 R11 R12 R13 RED
differential pair DSI_D1: +DSI_D1_P -DSI_D1_N
differential pair DSI_D0: +DSI_D0_P -DSI_D0_N
differential pair DSI_CK: +DSI_CK_P -DSI_CK_N
differential pair USB1_D: +USB1_D_P -USB1_D_N
differential pair USB0_D: +USB0_D_P -USB0_D_N

## Components (designator, comment, footprint, x,y, rotation, side; value= is the part's Value field where it differs from the comment)
3V3_EN "CMP-018-0005-A.3" TP-1.00MM 21.362,10.173 r180 bottom
3V3_J5 "CMP-018-0005-A.3" TP-1.00MM 75.805,12.713 r180 bottom
5V_EN "CMP-018-0005-A.3" TP-1.00MM 44.222,12.713 r180 bottom
5V_J5 "CMP-018-0005-A.3" TP-1.00MM 75.805,15.253 r90 bottom
BLE_DWAKE "CMP-018-0005-A.3" TP-1.00MM 18.822,40.653 r180 bottom
BLE_HWAKE "CMP-018-0005-A.3" TP-1.00MM 26.442,43.193 r180 bottom
BLE_ON "CMP-018-0005-A.3" TP-1.00MM 23.902,43.193 r180 bottom
BLUE "CMP-018-0005-A.3" TP-1.00MM 3.582,2.553 r270 bottom
BOOT0/PC13 "CMP-018-0005-A.3" TP-1.00MM 21.362,12.713 r180 bottom
C1 "GRM155R61H104KE19D" CAP-0402#1 30.566,22.548 r0 top value=100nF
C2 "FV21X472K102ECG" CAP-0805 8.35,36.35 r180 top value=4.7nF
C3 "FV21X472K102ECG" CAP-0805 6.05,14.6 r180 top value=4.7nF
C4 "DNP CAP 0402" CAP-0402#1 24.855,6.19 r0 top
C5 "GRM155R61H104KE19D" CAP-0402#1 60.813,25.253 r180 top value=100nF
C6 "GRM155R61H104KE19D" CAP-0402#1 60.813,30.653 r180 top value=100nF
C7 "GRM155R61H104KE19D" CAP-0402#1 60.813,26.603 r180 top value=100nF
C8 "GRM155R61H104KE19D" CAP-0402#1 60.813,29.303 r180 top value=100nF
C9 "GRM155R61H104KE19D" CAP-0402#1 58.269,23.16 r0 top value=100nF
C10 "GRM155R61H104KE19D" CAP-0402#1 60.813,27.953 r180 top value=100nF
C11 "GRM155R61H104KE19D" CAP-0402#1 53.139,23.16 r180 top value=100nF
C12 "GRM155R60J106ME05D" CAP-0402#2 39.826,28.088 r90 bottom value=10µF
C13 "GRM155R60J225KE95D" CAP-0402#2 41.539,30.66 r180 bottom value=2.2µF
C14 "GRM155R60J225KE95D" CAP-0402#2 43.826,29.888 r90 bottom value=2.2µF
C15 "GRM155R60J225KE95D" CAP-0402#2 41.326,25.718 r270 bottom value=2.2µF
C16 "GRM155R61H104KE19D" CAP-0402#2 38.161,25.853 r180 bottom value=100nF
C17 "GRM155R61H104KE19D" CAP-0402#2 39.526,26.288 r270 bottom value=100nF
C18 "GRM155R61H104KE19D" CAP-0402#1 33.746,24.598 r90 top value=100nF
C19 "GRM155R61H104KE19D" CAP-0402#1 50.056,30.753 r180 top value=100nF
C20 "GRM155R61H104KE19D" CAP-0402#1 43.55,10.685 r90 top value=100nF
C21 "GRM155R61H104KE19D" CAP-0402#2 43.726,26.288 r270 bottom value=100nF
C22 "GRM155R61H104KE19D" CAP-0402#2 40.426,26.288 r270 bottom value=100nF
C23 "GRM155R61H104KE19D" CAP-0402#2 42.826,26.288 r270 bottom value=100nF
C24 "GRM155R61H104KE19D" CAP-0402#2 43.961,27.653 r0 bottom value=100nF
C25 "GRM155R61H104KE19D" CAP-0402#2 43.961,28.553 r0 bottom value=100nF
C26 "GRM155R61H104KE19D" CAP-0402#2 43.361,31.603 r0 bottom value=100nF
C27 "GRM155R61H104KE19D" CAP-0402#1 46.226,36.288 r270 top value=100nF
C28 "GRM155R61H104KE19D" CAP-0402#1 39.526,36.288 r270 top value=100nF
C29 "GRM155R61H104KE19D" CAP-0402#1 36.476,36.288 r270 top value=100nF
C30 "GRM155R61H104KE19D" CAP-0402#2 42.926,29.888 r90 bottom value=100nF
C31 "GRM155R61H104KE19D" CAP-0402#2 40.261,29.453 r180 bottom value=100nF
C32 "GRM155R60J225KE95D" CAP-0402#1 50.056,29.253 r180 top value=2.2µF
C33 "GRM155R60J225KE95D" CAP-0402#1 37.526,36.288 r270 top value=2.2µF
C34 "GRM155R60J225KE95D" CAP-0402#1 33.746,26.568 r270 top value=2.2µF
C35 "GRM155R60J225KE95D" CAP-0402#1 45.026,36.288 r270 top value=2.2µF
C36 "GRM155R60J106ME05D" CAP-0402#1 44.5,18.865 r90 top value=10µF
C37 "GRM155R61H104KE19D" CAP-0402#1 25.152,43.909 r180 top value=100nF
C38 "CAP-0402-DNP" CAP-0402#1 7.6,45.665 r270 top
C39 "CAP-0402-DNP" CAP-0402#1 4.903,46.469 r270 top
C40 "GRM155R60J225KE95D" CAP-0402#1 9.835,48.804 r0 top value=2.2µF
C41 "C1005A475M6R3NT" CAP-0402#1 11.805,48.804 r0 top value=4.7µF
C42 "C1005A475M6R3NT" CAP-0402#1 7.873,48.804 r180 top value=4.7µF
C43 "GRM155R61H104KE19D" CAP-0402#1 26.957,12.914 r270 top value=100nF
C44 "GRM155R61H104KE19D" CAP-0402#1 23.078,12.344 r270 top value=100nF
C45 "C1608A106M250NT" CAP-0603 21.878,11.659 r90 top value=10µF
C46 "C1608A106M250NT" CAP-0603 20.478,11.659 r90 top value=10µF
C47 "0402N220J500CT" CAP-0402#1 27.382,10.599 r0 top value=22pF
C48 "C1608A106M250NT" CAP-0603 30.451,10.712 r90 top value=10µF
C49 "C1608A106M250NT" CAP-0603 29.045,10.712 r90 top value=10µF
C50 "GRM155R60J225KE95D" CAP-0402#1 24.768,10.111 r90 top value=2.2µF
C51 "C0402C180J5GACTU" CAP-0402#1 36.635,18 r180 top value=18pF
C52 "C0402H100J5GACTU" CAP-0402#1 41.991,19.143 r0 top value=10pF
C53 "C0402C180J5GACTU" CAP-0402#1 34.63,18 r0 top value=18pF
C54 "C0402H100J5GACTU" CAP-0402#1 40.126,19.143 r180 top value=10pF
C55 "DNP CAP 0402" CAP-0402#1 24.855,7.19 r0 top
C56 "DNP CAP 0402" CAP-0402#1 19.613,8.534 r180 top
C57 "GRM155R61H104KE19D" CAP-0402#1 19.254,41.11 r180 top value=100nF
C59 "GRM155R61H104KE19D" CAP-0402#1 48.842,10.459 r270 top value=100nF
C60 "C1608A106M250NT" CAP-0603 51.5,11.653 r270 top value=10µF
C61 "C1608A106M250NT" CAP-0603 51.5,14.453 r270 top value=10µF
C62 "C1608A106M250NT" CAP-0603 43.316,13.653 r270 top value=10µF
C63 "C1608A106M250NT" CAP-0603 41.716,13.653 r270 top value=10µF
C64 "GRM155R61H104KE19D" CAP-0402#1 44.433,14.022 r90 top value=100nF
C65 "CC0402JRNPO9BN101" CAP-0402#1 47.492,8.1 r270 top value=100pF
C66 "C1608A106M250NT" CAP-0603 40.116,13.653 r270 top value=10µF
C67 "C1608A106M250NT" CAP-0603 38.516,13.653 r270 top value=10µF
C68 "C1608A106M250NT" CAP-0603 50.1,11.653 r270 top value=10µF
C69 "C1608A106M250NT" CAP-0603 50.1,14.453 r270 top value=10µF
C72 "CAP-0402-DNP" CAP-0402#1 35.065,19.37 r270 top
C73 "GRM155R60J106ME05D" CAP-0402#1 35.426,36.288 r270 top value=10µF
C74 "GRM155R60J106ME05D" CAP-0402#1 34.426,36.288 r270 top value=10µF
C75 "GRM155R60J106ME05D" CAP-0402#1 49.126,36.288 r270 top value=10µF
C76 "GRM155R60J106ME05D" CAP-0402#1 50.126,36.288 r270 top value=10µF
C77 "GRM155R61H104KE19D" CAP-0402#1 33.426,36.288 r270 top value=100nF
C78 "GRM155R61H104KE19D" CAP-0402#1 51.126,36.288 r270 top value=100nF
C79 "GRM155R61H104KE19D" CAP-0402#1 50.126,20.353 r90 top value=100nF
C80 "GRM155R60J106ME05D" CAP-0402#1 52.426,36.288 r270 top value=10µF
C81 "GRM155R60J106ME05D" CAP-0402#1 53.426,36.288 r270 top value=10µF
C82 "GRM155R60J106ME05D" CAP-0402#1 33.565,19.37 r90 top value=10µF
C83 "GRM155R61H104KE19D" CAP-0402#1 32.665,19.37 r90 top value=100nF
D1 "PMEG6020AELRX" SOD123-1 5.275,33.062 r0 top
D2 "PRTR5V0U2X,215" SOT190P230X110-4N 8.3,39.1 r180 top
D4 "PRTR5V0U2X,215" SOT190P230X110-4N 11.546,32.86 r90 top
DFSDM1_CKOUT "CMP-018-0005-A.3" TP-1.00MM 89.345,17.779 r180 bottom
DFSDM1_DATIN0 "CMP-018-0005-A.3" TP-1.00MM 89.345,20.319 r180 bottom
DL1 "HSMG-C190" LEDC1608X80N-AK 1.675,33.062 r180 top
DL2 "UHD1110-FKA-CL1A13R3Q1BBQFMF3" UHD1110-FKA-CL1A13R3Q1BBQFMF3 8.1,2.1 r90 top
DOUT0 "CMP-018-0005-A.3" TP-1.00MM 26.862,20.319 r180 bottom
DOUT1 "CMP-018-0005-A.3" TP-1.00MM 13.322,20.319 r180 bottom
DOUT2 "CMP-018-0005-A.3" TP-1.00MM 26.862,22.859 r180 bottom
DOUT3 "CMP-018-0005-A.3" TP-1.00MM 13.322,22.859 r180 bottom
DOUT4 "CMP-018-0005-A.3" TP-1.00MM 26.862,25.399 r180 bottom
DOUT5 "CMP-018-0005-A.3" TP-1.00MM 13.322,25.399 r180 bottom
DOUT6 "CMP-018-0005-A.3" TP-1.00MM 26.862,27.939 r180 bottom
DOUT7 "CMP-018-0005-A.3" TP-1.00MM 13.322,27.939 r180 bottom
DSI_CK_N "CMP-018-0005-A.3" TP-1.00MM 75.805,35.559 r90 bottom
DSI_CK_P "CMP-018-0005-A.3" TP-1.00MM 75.805,38.099 r90 bottom
DSI_D0_P "CMP-018-0005-A.3" TP-1.00MM 75.805,33.019 r180 bottom
DSI_D1_N "CMP-018-0005-A.3" TP-1.00MM 75.805,40.639 r180 bottom
DSI_D1_P "CMP-018-0005-A.3" TP-1.00MM 75.805,43.179 r180 bottom
DSID0N "CMP-018-0005-A.3" TP-1.00MM 75.805,30.479 r180 bottom
Fiducial_1 "Fiducial mark 1mm" "Fiducial mark 1mm-Footprint-1" 27.5,13 r90 bottom
Fiducial_2 "Fiducial mark 1mm" "Fiducial mark 1mm-Footprint-1" 31.226,18.453 r90 top
Fiducial_3 "Fiducial mark 1mm" "Fiducial mark 1mm-Footprint-1" 60.726,32.953 r90 top
Fiducial_4 "Fiducial mark 1mm" "Fiducial mark 1mm-Footprint-1" 22.226,40.67 r90 top
Fiducial_5 "Fiducial mark 1mm" "Fiducial mark 1mm-Footprint-1" 52,41 r90 bottom
GND_J5 "CMP-018-0005-A.3" TP-1.00MM 75.805,27.939 r180 bottom
GREEN "CMP-018-0005-A.3" TP-1.00MM 8.662,2.553 r180 bottom
HREF "CMP-018-0005-A.3" TP-1.00MM 26.862,33.019 r180 bottom
I2S2_CK "CMP-018-0005-A.3" TP-1.00MM 75.805,22.859 r180 bottom
I2S2_MCK "CMP-018-0005-A.3" TP-1.00MM 75.805,25.399 r180 bottom
I2S2_SDO "CMP-018-0005-A.3" TP-1.00MM 75.805,20.319 r180 bottom
I2S2_WS "CMP-018-0005-A.3" TP-1.00MM 89.345,25.399 r180 bottom
IS2S_SDI "CMP-018-0005-A.3" TP-1.00MM 89.345,22.859 r180 bottom
J1 "HEADER TH 2.54mm VERT. 1x003POS" "PIN HEADER 2.54mm VERT. 1x3POS" 20.346,2.553 r0 top
J2 "USB-A-S-RA-CS11-SMT-HF-TR" USB-A-S-RA-CS11-SMT-HF-TR 5.9,23.675 r270 top locked
J5 "21TW-291" 21TW-291 82.575,26.669 r270 top locked
J6 "21TW-247" 21TW-247 20.092,26.669 r270 top
J7 "PH2-06-UA" 2X03 64.796,27.953 r90 top
J8 "22TW-428" FTSH-105-01-F-DV-Footprint-1 64.796,16.7 r270 top
J12 "CX90B-16P" CX90B-16P-Footprint-1 3.467,39.5 r270 top locked
J14 "U.FL-R-SMT-1(60)" U.FL-R-SMT-1(60)-1 2.103,46.904 r90 top
J15 "22TW-258" 22TW-258-Footprint-1 6.25,9.513 r0 top locked
JANALOG "20TW-887" "GIGA header custom analog" 58.446,2.553 r0 top locked
JDIGITAL "20TW-890" "GIGA Header custom digital" 53.366,50.813 r0 top locked
JSIDE "20TW-891" "GIGA custom header side-Footprint-1" 95.25,29.209 r0 top locked
JTAG_3V3 "CMP-018-0005-A.3" TP-1.00MM 62.002,17.793 r180 bottom
JTAG_GND "CMP-018-0005-A.3" TP-1.00MM 72.162,17.793 r180 bottom
JTAG_NRST "CMP-018-0005-A.3" TP-1.00MM 64.542,17.793 r180 bottom
JTAG_TCK_SCK "CMP-018-0005-A.3" TP-1.00MM 67.082,17.793 r180 bottom
JTAG_TMS/SWD "CMP-018-0005-A.3" TP-1.00MM 69.622,17.793 r180 bottom
L1 "SRP4020TA-100M" SRP4020 40.166,9.653 r180 top value=10u
L2 "LQM18PN2R2MGHD" FP-LQM18PN_GH-IPC_C 8.775,47.532 r0 top value=2.2µH
L3 "MAKK2016T3R3M" MAKK2016T3R3M-Footprint-1 28.788,13.201 r0 top value=3.3µH
L4 "LQM18DH470M70L" L-0603 46.553,16.454 r180 top
LPO_IN "CMP-018-0005-A.3" TP-1.00MM 14.742,43.193 r180 bottom
PB1 "IT-1185AP1C-160G-GTR" C&K_PTS820_NO_HOLES-1 3,51.24 r0 top
PB2 "IT-1185AP1C-160G-GTR" C&K_PTS820_NO_HOLES-1 3,2.1 r0 top
PB12 "CMP-018-0005-A.3" TP-1.00MM 75.805,17.779 r180 bottom
PCLK "CMP-018-0005-A.3" TP-1.00MM 13.322,30.479 r180 bottom
POWER_EN "CMP-018-0005-A.3" TP-1.00MM 13.322,17.779 r180 bottom
PWDN "CMP-018-0005-A.3" TP-1.00MM 26.862,17.779 r180 bottom
PWR_LED "CMP-018-0005-A.3" TP-1.00MM 3.582,36.843 r180 bottom
R1 "CRCW0402976KFKED" RES-0402 8.275,34.7 r180 top value=976k
R2 "RC0402FR-075K1L" RES-0402 7.1,41.6 r270 top value=5.1k
R3 "CRCW0402100KFKEDC" RES-0402 33.746,22.698 r90 top value=100k
R4 "CRCW0402100KFKEDC" RES-0402 9.9,4.2 r0 top value=100k
R5 "CRCW04020000Z0EDC" RES-0402 40.526,36.328 r90 top value=0
R6 "CRCW04020000Z0EDC" RES-0402 36.2,19.375 r90 top value=0
R7 "CRCW0402330RJNED" RES-0402 45.8,18.865 r270 top value=330
R8 "CRCW04020000Z0EDC" RES-0402 36.675,18.9 r180 top value=0
R9 "CRCW04020000Z0EDC" RES-0402 18.619,43.785 r90 top value=0
R10 "CRCW0402330RJNED" RES-0402 8.6,33.1 r180 top value=330
R11 "CRCW0402330RJNED" RES-0402 9.9,1 r0 top value=330
R12 "CRCW0402330RJNED" RES-0402 9.9,2.1 r0 top value=330
R13 "CRCW0402330RJNED" RES-0402 9.9,3.2 r0 top value=330
R14 "CRCW04020000Z0EDC" RES-0402 6.236,46.564 r135 top value=0
R15 "CRCW0402976KFKED" RES-0402 27.382,11.479 r0 top value=976k
R16 "CRCW0402220KFKED" RES-0402 25.758,10.111 r90 top value=220k
R17 "RC0402FR-075K1L" RES-0402 8.1,41.6 r270 top value=5.1k
R18 "CRCW0402976KFKED" RES-0402 3.125,14.6 r0 top value=976k
R19 "RC0402FR-075K1L" RES-0402 29.235,40.898 r0 top value=5.1k
R20 "RC0402FR-075K1L" RES-0402 32.085,40.898 r180 top value=5.1k
R21 "CRCW0402100KFKEDC" RES-0402 69.621,14.16 r180 top value=100k
R22 "CRCW04020000Z0EDC" RES-0402 24.855,4.99 r180 top value=0
R23 "CRCW04020000Z0EDC" RES-0402 28.095,4.99 r180 top value=0
R24 "CRCW04020000Z0EDC" RES-0402 28.06,6.419 r180 top value=0
R25 "CRCW04020000Z0EDC" RES-0402 17.878,9.309 r270 top value=0
R26 "RC0402FR-075K1L" RES-0402 29.235,38.098 r0 top value=5.1k
R27 "RC0402FR-075K1L" RES-0402 29.235,39.498 r0 top value=5.1k
R28 "RC0402FR-075K1L" RES-0402 32.085,39.498 r0 top value=5.1k
R29 "RC0402FR-075K1L" RES-0402 32.085,38.098 r0 top value=5.1k
R30 "CRCW0402100KFKEDC" RES-0402 23.078,10.111 r270 top value=100k
R31 "CRCW0402100KFKEDC" RES-0402 45.667,8.575 r0 top value=100k
R32 "RC0402FR-075K1L" RES-0402 15.98,13.1 r90 top value=5.1k
R33 "CRCW040219K1FKEDC" RES-0402 48.842,8.1 r270 top value=19.1k
R34 "RC0402FR-075K1L" RES-0402 14.98,13.1 r90 top value=5.1k
R35 "CRCW040219K1FKEDC" RES-0402 48.831,13.072 r90 top value=19.1k
R36 "RC0402FR-075K1L" RES-0402 46.8,13.753 r180 top value=5.1k
R37 "RC0402FR-075K1L" RES-0402 13.98,13.1 r90 top value=5.1k
R38 "CRCW04020000Z0EDC" RES-0402 36.716,12.128 r270 top value=0
R39 "CRCW04020000Z0EDC" RES-0402 31.874,10.687 r270 top value=0
R40 "CRCW04020000Z0EDC" RES-0402 19.6,43.785 r90 top value=0
RED "CMP-018-0005-A.3" TP-1.00MM 6.122,2.553 r270 bottom
SCL4 "CMP-018-0005-A.3" TP-1.00MM 13.322,35.559 r180 bottom
SDATA "CMP-018-0005-A.3" TP-1.00MM 26.862,35.559 r180 bottom
SDIO_CLK "CMP-018-0005-A.3" TP-1.00MM 23.902,45.733 r180 bottom
SDIO_CMD "CMP-018-0005-A.3" TP-1.00MM 18.822,45.733 r180 bottom
SDIO_D0 "CMP-018-0005-A.3" TP-1.00MM 26.442,45.733 r180 bottom
SDIO_D1 "CMP-018-0005-A.3" TP-1.00MM 18.822,43.193 r180 bottom
SDIO_D2 "CMP-018-0005-A.3" TP-1.00MM 21.362,45.733 r180 bottom
SDIO_D3 "CMP-018-0005-A.3" TP-1.00MM 28.982,45.733 r180 bottom
U1 "STM32H747XIH6" STM32H747XIH6-Footprint-1 41.726,27.953 r0 top locked
U3 "AS4C4M16SA-6BIN" AS4C4M16SA-7BCN-Footprint-1 55.504,27.96 r180 top locked
U4 "ATECC608A-MAHDA-T" UDFN8 22.326,43.17 r270 top
U5 "LBEE5KL1DX-883" LBEE5KL1DX-883 13.915,44.975 r0 top locked
U6 "MP2322GQH" QFN50P150X200X90-8L 25.246,12.229 r0 top
U7 "AP63200WU-7" SOT95P280X100-6N 46.2,11.2 r180 top
U8 "AT25SF128A-MHB-T" PSON127P600X60_HS-9N 29.796,27.953 r270 top
U9 "SLG59H1341C" BGA9C40P3X3_121X121X62 13.1,15.3 r90 top
UART7_CTS "CMP-018-0005-A.3" TP-1.00MM 18.822,10.173 r180 bottom
UART7_RTS "CMP-018-0005-A.3" TP-1.00MM 16.282,10.173 r180 bottom
UART7_RX "CMP-018-0005-A.3" TP-1.00MM 21.362,40.653 r180 bottom
UART7_TX "CMP-018-0005-A.3" TP-1.00MM 16.282,12.713 r180 bottom
USB0_CC1 "CMP-018-0005-A.3" TP-1.00MM 6.122,40.653 r180 bottom
USB0_CC2 "CMP-018-0005-A.3" TP-1.00MM 3.582,40.653 r180 bottom
USB0_DN "CMP-018-0005-A.3" TP-1.00MM 9.163,37.809 r180 bottom
USB0_DP "CMP-018-0005-A.3" TP-1.00MM 9.163,40.349 r180 bottom
USB0_VBUS "CMP-018-0005-A.3" TP-1.00MM 6.122,36.843 r180 bottom
USB1_DN "CMP-018-0005-A.3" TP-1.00MM 44.221,39.463 r0 bottom
USB1_DP "CMP-018-0005-A.3" TP-1.00MM 44.221,36.923 r0 bottom
USB1_VBUS "CMP-018-0005-A.3" TP-1.00MM 13.742,12.713 r180 bottom
VSYNC "CMP-018-0005-A.3" TP-1.00MM 13.322,33.019 r180 bottom
WIFI_HWAKE "CMP-018-0005-A.3" TP-1.00MM 21.362,7.633 r180 bottom
WIFI_ON "CMP-018-0005-A.3" TP-1.00MM 21.362,43.193 r180 bottom
XCLK "CMP-018-0005-A.3" TP-1.00MM 26.862,30.479 r180 bottom
Y1 "SIT1532AI-J4-DCC-32.768E" SiT1532AI-J4-DCC-32.768E-Footprint-1 19.319,42.21 r180 top
Y2 "CM315D32768DZFT" ABS07 35.5,16.31 r0 top
Y3 "FTX16.000M12SM3S-30/30" CRYSTAL_3.2x2.5mm_16MHz 41.2,16.96 r0 top

## Footprints (in the part's own frame and the unit in brackets; to place one, negate y for a bottom-side part, rotate by r counter-clockwise, add the part's x,y. Pads: shape width x height; smd on the part's side, far side on the other; paste and mask are expansions set on the pad)
2X03 [mm]
  oct 1.501x1.501 / inner oct 1.524x1.524 / far side oct 1.501x1.501 hole 0.95: 1(2.54,1.27) 2(2.54,-1.27) 3(0,1.27) 4(0,-1.27) 5(-2.54,1.27) 6(-2.54,-1.27)
  body extent -3.81,-2.54 3.81,2.5, height 8.5
21TW-247 [mm]
  round 0 hole 1.1 unplated mask+0.2: 0(-11.43,-1.27) 0(-11.43,1.27) 0(-8.89,-1.27) 0(-8.89,1.27) 0(-6.35,-1.27) 0(-6.35,1.27) 0(-3.81,-1.27) 0(-3.81,1.27) 0(-1.27,1.27) 0(-1.27,-1.27) 0(1.27,1.27) 0(1.27,-1.27) 0(3.81,-1.27) 0(3.81,1.27) 0(6.35,-1.27) 0(6.35,1.27) 0(8.89,-1.27) 0(8.89,1.27) 0(11.43,-1.27) 0(11.43,1.27)
  round 0 hole 1.8 unplated paste-2539.97: 0(-10.16,0) 0(10.16,0)
  rrect25% 1.02x2.1 smd mask+0.1: 1(-11.43,-3.05)
  rrect50% 1.02x2.1 smd mask+0.1: 2(-11.43,3.05) 3(-8.89,-3.05) 4(-8.89,3.05) 5(-6.35,-3.05) 6(-6.35,3.05) 7(-3.81,-3.05) 8(-3.81,3.05) 9(-1.27,-3.05) 10(-1.27,3.05) 11(1.27,-3.05) 12(1.27,3.05) 13(3.81,-3.05) 14(3.81,3.05) 15(6.35,-3.05) 16(6.35,3.05) 17(8.89,-3.05) 18(8.89,3.05) 19(11.43,-3.05) 20(11.43,3.05)
  body extent -12.7,-3.29 12.7,3.29, height 3.71
21TW-291 [mm]
  round 0 hole 1.1 unplated mask+0.2: 0(-13.97,-1.27) 0(-13.97,1.27) 0(-11.43,-1.27) 0(-11.43,1.27) 0(-8.89,-1.27) 0(-8.89,1.27) 0(-6.35,-1.27) 0(-6.35,1.27) 0(-3.81,-1.27) 0(-3.81,1.27) 0(-1.27,1.27) 0(-1.27,-1.27) 0(1.27,1.27) 0(1.27,-1.27) 0(3.81,-1.27) 0(3.81,1.27) 0(6.35,-1.27) 0(6.35,1.27) 0(8.89,-1.27) 0(8.89,1.27) 0(11.43,-1.27) 0(11.43,1.27) 0(13.97,-1.27) 0(13.97,1.27)
  round 0 hole 1.8 unplated paste-2539.97: 0(-12.7,0) 0(12.7,0)
  rrect25% 1.02x2.1 smd mask+0.1: 1(-13.97,-3.05)
  rrect50% 1.02x2.1 smd mask+0.1: 2(-13.97,3.05) 3(-11.43,-3.05) 4(-11.43,3.05) 5(-8.89,-3.05) 6(-8.89,3.05) 7(-6.35,-3.05) 8(-6.35,3.05) 9(-3.81,-3.05) 10(-3.81,3.05) 11(-1.27,-3.05) 12(-1.27,3.05) 13(1.27,-3.05) 14(1.27,3.05) 15(3.81,-3.05) 16(3.81,3.05) 17(6.35,-3.05) 18(6.35,3.05) 19(8.89,-3.05) 20(8.89,3.05) 21(11.43,-3.05) 22(11.43,3.05) 23(13.97,-3.05) 24(13.97,3.05)
  body extent -15.27,-3.29 15.21,3.29, height 3.71
22TW-258-Footprint-1 [mm]
  oval 1.4x2.1 hole 0.8 slot 1.5 at 90 deg paste-2539.97 mask+0.2: 1(6.15,0)
  oval 2.1x1.4 hole 0.8 slot 1.5 at 0 deg paste-2539.97 mask+0.2: 2(5.35,2.85) 3(5.35,-2.85) 4(-2.65,-3.3) 4(-2.65,3.3)
  round 1 hole 1.2 unplated paste-2539.97 mask+0.3: NC1(-4.15,0) NC2(2.85,0)
  body extent -8.43,-3.5 6.15,3.5, height 6
ABS07 [mm]
  rrect50% 1.1x1.9 smd: 1(-1.25,0) 2(1.25,0)
  body extent -1.65,-0.83 1.65,0.83, height 0.9
AS4C4M16SA-7BCN-Footprint-1 [mm]
  round 0.41 smd mask+0.05: A1(-3.2,-3.2) A2(-3.2,-2.4) A3(-3.2,-1.6) A7(-3.2,1.6) A8(-3.2,2.4) A9(-3.2,3.2) B1(-2.4,-3.2) B2(-2.4,-2.4) B3(-2.4,-1.6) B7(-2.4,1.6) B8(-2.4,2.4) B9(-2.4,3.2) C1(-1.6,-3.2) C2(-1.6,-2.4) C3(-1.6,-1.6) C7(-1.6,1.6) C8(-1.6,2.4) C9(-1.6,3.2) D1(-0.8,-3.2) D2(-0.8,-2.4) D3(-0.8,-1.6) D7(-0.8,1.6) D8(-0.8,2.4) D9(-0.8,3.2) E1(0,-3.2) E2(0,-2.4) E3(0,-1.6) E7(0,1.6) E8(0,2.4) E9(0,3.2) F1(0.8,-3.2) F2(0.8,-2.4) F3(0.8,-1.6) F7(0.8,1.6) F8(0.8,2.4) F9(0.8,3.2) G1(1.6,-3.2) G2(1.6,-2.4) G3(1.6,-1.6) G7(1.6,1.6) G8(1.6,2.4) G9(1.6,3.2) H1(2.4,-3.2) H2(2.4,-2.4) H3(2.4,-1.6) H7(2.4,1.6) H8(2.4,2.4) H9(2.4,3.2) J1(3.2,-3.2) J2(3.2,-2.4) J3(3.2,-1.6) J7(3.2,1.6) J8(3.2,2.4) J9(3.2,3.2)
  silkscreen extent -4.31,-4.31 -4.21,-4.21, body extent -4,-4 4,4, height 1.15
BGA9C40P3X3_121X121X62 [mm] "BGA, 9-Leads, Body 1,21x1,21mmx0,63mm, Pitch 0,40mm"
  round 0.25 smd mask+0.05: A1(-0.4,0.4) A2(0,0.4) A3(0.4,0.4) B1(-0.4,0) B2(0,0) B3(0.4,0) C1(-0.4,-0.4) C2(0,-0.4) C3(0.4,-0.4)
  silkscreen extent -0.76,0.66 -0.66,0.76, body extent -0.61,-0.61 0.61,0.61, height 0.63
C&K_PTS820_NO_HOLES-1 [mm]
  rrect49% 1x1.6 smd mask+0.05: 1(-2.1,0) 2(2.1,0)
  body extent -2.25,-1.45 2.25,1.45, height 2
CAP-0402#1 [mm] "Chip Capacitor, 2-Leads, Body  0402 (in) 1005 (mm), IPC Medium Density"
  rrect52% 0.63x0.58 smd mask+0.05: 1(-0.435,0) 2(0.435,0)
  body extent -0.5,-0.25 0.5,0.25, height 0.5
CAP-0402#2 [mm] "Chip Capacitor, 2-Leads, Body  0402 (in) 1005 (mm), IPC Medium Density"
  rrect52% 0.63x0.58 smd mask+0: 1(-0.435,0) 2(0.435,0)
  body extent -0.5,-0.25 0.5,0.25, height 0.5
CAP-0603 [mm] "Chip Capacitor, Body 0603 imperial,1.6x0.8mm, IPC High Density"
  rrect51% 0.87x0.97 smd mask+0.05: 1(-0.75,0) 2(0.75,0)
  body extent -0.8,-0.4 0.8,0.4, height 0.8
CAP-0805 [mm] "Chip Capacitor, Body 0805 imperial, 2.0x1.2mm, IPC Medium Density"
  rrect45% 1.11x1.47 smd mask+0.05: 1(-0.85,0) 2(0.85,0)
  body extent -1,-0.62 1,0.63, height 1.25
CRYSTAL_3.2x2.5mm_16MHz [mm]
  rrect10% 1.3x1.05 smd: 1(-1.15,-0.925) 2(1.15,-0.925) 3(1.15,0.925) 4(-1.15,0.925)
  body extent -1.6,-1.25 1.6,1.25, height 0.8
CX90B-16P-Footprint-1 [mm]
  rect 0.57x0.85 smd mask+0.05: A1(-3.635,1.988) A12(3.635,1.988)
  rect 0.25x0.85 smd mask+0.05: A4(-2.275,1.988) A9(2.275,1.988) B1(3.025,1.988) B4(1.825,1.988) B9(-1.825,1.988) B12(-3.025,1.988)
  rect 0.2x0.85 smd mask+0.05: A5(-1.4,1.988) A6(-0.6,1.988) A7(0.6,1.988) A8(1.4,1.988) B5(1,1.988) B6(0.2,1.988) B7(-0.2,1.988) B8(-1,1.988)
  round 0.2 hole 0.45 unplated paste-2539.97 mask+0.2: FIXING(-3.32,0.988) FIXING(3.32,0.988)
  rect 1.71x2.6 smd paste-0.3 mask+0.05: FIXING(-1.565,-1.837) FIXING(1.565,-1.837)
  oval 1.05x2.6 hole 0.6 slot 2 at 90 deg copper offset -0.025,0 mask+0.05: SHIELD1(-4.62,1.563)
  oval 1.05x2.6 hole 0.6 slot 2 at 90 deg copper offset 0.025,0 mask+0.05: SHIELD2(4.62,1.563)
  oval 1.2x2.3 hole 0.6 slot 1.7 at 90 deg mask+0.05: SHIELD3(-4.42,-1.987) SHIELD4(4.42,-1.987)
  body extent -4.77,-4.4 4.77,2.4, height 3.17
"Fiducial mark 1mm-Footprint-1" [mm]
  round 1 smd paste-10 mask+0.5: 1(0,0)
  Top Layer keep-out circle w1: c0,0 r0.5
FP-LQM18PN_GH-IPC_C [mm]
  rrect50% 0.7x0.7 smd: 1(-0.7,0) 2(0.7,0)
  body extent -0.8,-0.4 0.8,0.4, height 1
FTSH-105-01-F-DV-Footprint-1 [mm]
  rect 0.76x2.3 smd: 1(-2.54,-1.95) 2(-2.54,1.95) 3(-1.27,-1.95) 4(-1.27,1.95) 5(0,-1.95) 6(0,1.95) 7(1.27,-1.95) 8(1.27,1.95) 9(2.54,-1.95) 10(2.54,1.95)
  silkscreen extent -2.59,-3.66 -2.49,-3.56, body extent -3.17,-2.92 3.17,2.92, height 5.98
"GIGA custom header side-Footprint-1" [mm]
  round 1.7 hole 1 mask+0.2: 1(-1.27,21.59) 2(1.27,21.59) 3(-1.27,19.05) 4(1.27,19.05) 5(-1.27,16.51) 6(1.27,16.51) 7(-1.27,13.97) 8(1.27,13.97) 9(-1.27,11.43) 10(1.27,11.43) 11(-1.27,8.89) 12(1.27,8.89) 13(-1.27,6.35) 14(1.27,6.35) 15(-1.27,3.81) 16(1.27,3.81) 17(-1.27,1.27) 18(1.27,1.27) 19(-1.27,-1.27) 20(1.27,-1.27) 21(-1.27,-3.81) 22(1.27,-3.81) 23(-1.27,-6.35) 24(1.27,-6.35) 25(-1.27,-8.89) 26(1.27,-8.89) 27(-1.27,-11.43) 28(1.27,-11.43) 29(-1.27,-13.97) 30(1.27,-13.97) 31(-1.27,-16.51) 32(1.27,-16.51) 33(-1.27,-19.05) 34(1.27,-19.05) 35(-1.27,-21.59) 36(1.27,-21.59)
  body extent -2.5,-22.9 2.5,23.32, height 8.52
"GIGA header custom analog" [mm]
  round 1.7 hole 1 mask+0.2: 1(-30.48,0) 2(-27.94,0) 3(-25.4,0) 4(-22.86,0) 5(-20.32,0) 6(-17.78,0) 7(-15.24,0) 8(-12.7,0) 9(-7.62,0) 10(-5.08,0) 11(-2.54,0) 12(0,0) 13(2.54,0) 14(5.08,0) 15(7.62,0) 16(10.16,0) 17(15.24,0) 18(17.78,0) 19(20.32,0) 20(22.86,0) 21(25.4,0) 22(27.94,0) 23(30.48,0) 24(33.02,0)
  body extent -32.1,-1.25 34.54,1.25, height 8.51
"GIGA Header custom digital" [mm]
  round 1.7 hole 1 mask+0.2: 1(-34.544,0) 2(-32.004,0) 3(-29.464,0) 4(-26.924,0) 5(-24.384,0) 6(-21.844,0) 7(-19.304,0) 8(-16.764,0) 9(-14.224,0) 10(-11.684,0) 11(-7.62,0) 12(-5.08,0) 13(-2.54,0) 14(0,0) 15(2.54,0) 16(5.08,0) 17(7.62,0) 18(10.16,0) 19(15.24,0) 20(17.78,0) 21(20.32,0) 22(22.86,0) 23(25.4,0) 24(27.94,0) 25(30.48,0) 26(33.02,0)
  body extent -36.09,-1.25 34.51,1.25, height 8.52
L-0603 [mm] "Chip Inductor - Body 0603 imperial,1.6x0.8mm, IPC High Density"
  rrect51% 0.75x0.87 smd mask+0: 1(-0.71,0) 2(0.71,0)
  body extent -0.8,-0.4 0.8,0.4, height 0.8
LBEE5KL1DX-883 [mm]
  rrect50% 0.28x0.64 smd mask+0.05: 1(-2.25,-2.015) 2(-1.8,-2.015) 3(-1.35,-2.015) 4(-0.9,-2.015) 5(-0.45,-2.015) 6(0,-2.015) 7(0.45,-2.015) 8(0.9,-2.015) 9(1.35,-2.015) 10(1.8,-2.015) 11(2.25,-2.015) 22(2.25,2.015) 23(1.8,2.015) 24(1.35,2.015) 25(0.9,2.015) 26(0.45,2.015) 27(0,2.015) 28(-0.45,2.015) 29(-0.9,2.015) 30(-1.35,2.015) 31(-1.8,2.015) 32(-2.25,2.015)
  rrect50% 0.64x0.4 smd mask+0.05: 12(2.915,-2.087) 21(2.915,2.087) 33(-2.915,2.087) 42(-2.915,-2.087)
  rrect50% 0.64x0.28 smd mask+0.05: 13(2.915,-1.575) 14(2.915,-1.125) 15(2.915,-0.675) 16(2.915,-0.225) 17(2.915,0.225) 18(2.915,0.675) 19(2.915,1.125) 20(2.915,1.575) 34(-2.915,1.575) 35(-2.915,1.125) 36(-2.915,0.675) 37(-2.915,0.225) 38(-2.915,-0.225) 39(-2.915,-0.675) 40(-2.915,-1.125) 41(-2.915,-1.575)
  round 0.2 smd paste+0 mask+0.05: 43(-1,-0.75)
  rrect10% 1x1 smd mask+0.05: 44(1,-0.75) 45(-1,0.75) 46(1,0.75)
  Top Layer region: -1.485,-0.765 -1.496,-0.748 -1.5,-0.729 -1.5,-0.729 -1.5,-0.3 -1.496,-0.281 -1.485,-0.265 -1.469,-0.254 -1.45,-0.25 -1.45,-0.25 -0.55,-0.25 -0.531,-0.254 -0.515,-0.265 -0.504,-0.281 -0.5,-0.3 -0.5,-0.3 -0.5,-1.2 -0.504,-1.219 -0.515,-1.235 -0.531,-1.246 -0.55,-1.25 -0.55,-1.25 -0.979,-1.25 -0.998,-1.246 -1.015,-1.235 -1.015,-1.235
  silkscreen extent -3.56,-2.67 -3.46,-2.57, body extent -3.47,-2.57 3.48,2.58, height 1.1
LEDC1608X80N-AK [mm]
  rrect50% 0.72x0.87 smd: A(0.725,0) C(-0.725,0)
  body extent -0.8,-0.4 0.8,0.4, height 0.79
MAKK2016T3R3M-Footprint-1 [mm]
  rect 0.7x1.8 smd mask+0.05: 1(-0.75,0) 2(0.75,0)
  body extent -1,-0.8 1,0.8, height 1
"PIN HEADER 2.54mm VERT. 1x3POS" [mm]
  round 1.7 hole 1 mask+0.2: 1(-2.54,0) 2(0,0) 3(2.54,0)
PSON127P600X60_HS-9N [mm] "PSON, 8-Leads, Body 5,00x6,00mm, Pitch 1,27mm, Thermal Pad 4,00x3,40mm, IPC Medium Density"
  rect 0.8x0.5 smd mask+0.05: 1(-2.67,1.905) 2(-2.67,0.635) 3(-2.67,-0.635) 4(-2.67,-1.905) 5(2.67,-1.905) 6(2.67,-0.635) 7(2.67,0.635) 8(2.67,1.905)
  rect 3.4x4 smd paste-10 mask+0.05: 9(0,0)
  silkscreen extent -3.22,2.62 -3.13,2.72, body extent -3.05,-2.55 3.05,2.55, height 0.6
QFN50P150X200X90-8L [mm] "QFN, 8-Leads, Body 1,50x2,00mm, Pitch 0,50mm, IPC High Density"
  round 0.025 smd mask+0.05: 1(-0.7,0.75)
  rrect25% 0.7x0.25 smd mask+0.05: 2(-0.7,0.25) 3(-0.7,-0.25) 4(-0.7,-0.75) 5(0.7,-0.75) 6(0.7,-0.25) 7(0.7,0.25) 8(0.7,0.75)
  Top Layer region: -1.044,0.625 -1.056,0.627 -1.066,0.634 -1.073,0.644 -1.075,0.656 -1.075,0.656 -1.075,0.844 -1.073,0.856 -1.066,0.866 -1.056,0.873 -1.044,0.875 -1.044,0.875 -0.452,0.875 -0.325,0.748 -0.325,0.656 -0.327,0.644 -0.334,0.634 -0.344,0.627 -0.356,0.625 -0.356,0.625
  silkscreen extent -1.07,1.14 -0.97,1.24, body extent -0.8,-1.05 0.8,1.05, height 0.9
RES-0402 [mm] "Chip Resistor, 2-Leads, Body  0402 (in) 1005 (mm), IPC Medium Density"
  rrect51% 0.55x0.58 smd mask+0.05: 1(-0.475,0) 2(0.475,0)
  body extent -0.5,-0.25 0.5,0.25, height 0.34
SiT1532AI-J4-DCC-32.768E-Footprint-1 [mm]
  round 0.25 smd mask+0.02: 1(-0.5,-0.205) 2(0.5,-0.205) 3(0.5,0.205) 4(-0.5,0.205)
  body extent -0.77,-0.42 0.77,0.42, height 0.55
SOD123-1 [mm]
  rrect50% 0.91x1.22 smd: A(1.635,0) C(-1.635,0)
  silkscreen extent -0.6,-0.6 0.6,0.6, body extent -1.85,-1 1.85,1, height 1.2
SOT95P280X100-6N [mm] "SOT23, 6-Leads, Body 2,90x2,80mm, Pitch 0,95mm, IPC Medium Density"
  rrect50% 1x0.55 smd mask+0.05: 1(-1.35,0.95) 2(-1.35,0) 3(-1.35,-0.95) 4(1.35,-0.95) 5(1.35,0) 6(1.35,0.95)
  silkscreen extent -1.29,1.58 -1.19,1.68, body extent -1.4,-1.5 1.4,1.5, height 1
SOT190P230X110-4N [mm]
  rrect33% 1.01x0.91 smd paste+0 mask+0.05: 1(-0.75,-0.955)
  rrect49% 0.61x0.91 smd paste+0 mask+0.05: 2(0.95,-0.955) 3(0.95,0.955) 4(-0.95,0.955)
  silkscreen extent -1.73,-1.03 -1.63,-0.93, body extent -1.45,-1.15 1.45,1.15, height 1
SRP4020 [mm]
  rect 1.5x2.4 smd: 1(-1.85,0) 2(1.85,0)
  body extent -2.15,-2 2.15,2, height 1.9
STM32H747XIH6-Footprint-1 [mm]
  round 0.37 smd: A1(-6.4,-6.4) A2(-6.4,-5.6) A3(-6.4,-4.8) A4(-6.4,-4) A5(-6.4,-3.2) A6(-6.4,-2.4) A7(-6.4,-1.6) A8(-6.4,-0.8) A9(-6.4,0) A10(-6.4,0.8) A11(-6.4,1.6) A12(-6.4,2.4) A13(-6.4,3.2) A14(-6.4,4) A15(-6.4,4.8) A16(-6.4,5.6) A17(-6.4,6.4) B1(-5.6,-6.4) B2(-5.6,-5.6) B3(-5.6,-4.8) B4(-5.6,-4) B5(-5.6,-3.2) B6(-5.6,-2.4) B7(-5.6,-1.6) B8(-5.6,-0.8) B9(-5.6,0) B10(-5.6,0.8) B11(-5.6,1.6) B12(-5.6,2.4) B13(-5.6,3.2) B14(-5.6,4) B15(-5.6,4.8) B16(-5.6,5.6) B17(-5.6,6.4) C1(-4.8,-6.4) C2(-4.8,-5.6) C3(-4.8,-4.8) C4(-4.8,-4) C5(-4.8,-3.2) C6(-4.8,-2.4) C7(-4.8,-1.6) C8(-4.8,-0.8) C9(-4.8,0) C10(-4.8,0.8) C11(-4.8,1.6) C12(-4.8,2.4) C13(-4.8,3.2) C14(-4.8,4) C15(-4.8,4.8) C16(-4.8,5.6) C17(-4.8,6.4) D1(-4,-6.4) D2(-4,-5.6) D3(-4,-4.8) D4(-4,-4) D5(-4,-3.2) D6(-4,-2.4) D7(-4,-1.6) D8(-4,-0.8) D9(-4,0) D10(-4,0.8) D11(-4,1.6) D12(-4,2.4) D13(-4,3.2) D14(-4,4) D15(-4,4.8) D16(-4,5.6) D17(-4,6.4) E1(-3.2,-6.4) E2(-3.2,-5.6) E3(-3.2,-4.8) E4(-3.2,-4) E5(-3.2,-3.2) E6(-3.2,-2.4) E7(-3.2,-1.6) E8(-3.2,-0.8) E9(-3.2,0) E10(-3.2,0.8) E11(-3.2,1.6) E12(-3.2,2.4) E13(-3.2,3.2) E14(-3.2,4) E15(-3.2,4.8) E16(-3.2,5.6) E17(-3.2,6.4) F1(-2.4,-6.4) F2(-2.4,-5.6) F3(-2.4,-4.8) F4(-2.4,-4) F5(-2.4,-3.2) F13(-2.4,3.2) F14(-2.4,4) F15(-2.4,4.8) F16(-2.4,5.6) F17(-2.4,6.4) G1(-1.6,-6.4) G2(-1.6,-5.6) G3(-1.6,-4.8) G4(-1.6,-4) G5(-1.6,-3.2) G7(-1.6,-1.6) G8(-1.6,-0.8) G9(-1.6,0) G10(-1.6,0.8) G11(-1.6,1.6) G13(-1.6,3.2) G14(-1.6,4) G15(-1.6,4.8) G16(-1.6,5.6) G17(-1.6,6.4) H1(-0.8,-6.4) H2(-0.8,-5.6) H3(-0.8,-4.8) H4(-0.8,-4) H5(-0.8,-3.2) H7(-0.8,-1.6) H8(-0.8,-0.8) H9(-0.8,0) H10(-0.8,0.8) H11(-0.8,1.6) H13(-0.8,3.2) H14(-0.8,4) H15(-0.8,4.8) H16(-0.8,5.6) H17(-0.8,6.4) J1(0,-6.4) J2(0,-5.6) J3(0,-4.8) J4(0,-4) J5(0,-3.2) J7(0,-1.6) J8(0,-0.8) J9(0,0) J10(0,0.8) J11(0,1.6) J13(0,3.2) J14(0,4) J15(0,4.8) J16(0,5.6) J17(0,6.4) K1(0.8,-6.4) K2(0.8,-5.6) K3(0.8,-4.8) K4(0.8,-4) K5(0.8,-3.2) K7(0.8,-1.6) K8(0.8,-0.8) K9(0.8,0) K10(0.8,0.8) K11(0.8,1.6) K13(0.8,3.2) K14(0.8,4) K15(0.8,4.8) K16(0.8,5.6) K17(0.8,6.4) L1(1.6,-6.4) L2(1.6,-5.6) L3(1.6,-4.8) L4(1.6,-4) L5(1.6,-3.2) L7(1.6,-1.6) L8(1.6,-0.8) L9(1.6,0) L10(1.6,0.8) L11(1.6,1.6) L13(1.6,3.2) L14(1.6,4) L15(1.6,4.8) L16(1.6,5.6) L17(1.6,6.4) M1(2.4,-6.4) M2(2.4,-5.6) M3(2.4,-4.8) M4(2.4,-4) M5(2.4,-3.2) M13(2.4,3.2) M14(2.4,4) M15(2.4,4.8) M16(2.4,5.6) M17(2.4,6.4) N1(3.2,-6.4) N2(3.2,-5.6) N3(3.2,-4.8) N4(3.2,-4) N5(3.2,-3.2) N6(3.2,-2.4) N7(3.2,-1.6) N8(3.2,-0.8) N9(3.2,0) N10(3.2,0.8) N11(3.2,1.6) N12(3.2,2.4) N13(3.2,3.2) N14(3.2,4) N15(3.2,4.8) N16(3.2,5.6) N17(3.2,6.4) P1(4,-6.4) P2(4,-5.6) P3(4,-4.8) P4(4,-4) P5(4,-3.2) P6(4,-2.4) P7(4,-1.6) P8(4,-0.8) P9(4,0) P10(4,0.8) P11(4,1.6) P12(4,2.4) P13(4,3.2) P14(4,4) P15(4,4.8) P16(4,5.6) P17(4,6.4) R1(4.8,-6.4) R2(4.8,-5.6) R3(4.8,-4.8) R4(4.8,-4) R5(4.8,-3.2) R6(4.8,-2.4) R7(4.8,-1.6) R8(4.8,-0.8) R9(4.8,0) R10(4.8,0.8) R11(4.8,1.6) R12(4.8,2.4) R13(4.8,3.2) R14(4.8,4) R15(4.8,4.8) R16(4.8,5.6) R17(4.8,6.4) T1(5.6,-6.4) T2(5.6,-5.6) T3(5.6,-4.8) T4(5.6,-4) T5(5.6,-3.2) T6(5.6,-2.4) T7(5.6,-1.6) T8(5.6,-0.8) T9(5.6,0) T10(5.6,0.8) T11(5.6,1.6) T12(5.6,2.4) T13(5.6,3.2) T14(5.6,4) T15(5.6,4.8) T16(5.6,5.6) T17(5.6,6.4) U1(6.4,-6.4) U2(6.4,-5.6) U3(6.4,-4.8) U4(6.4,-4) U5(6.4,-3.2) U6(6.4,-2.4) U7(6.4,-1.6) U8(6.4,-0.8) U9(6.4,0) U10(6.4,0.8) U11(6.4,1.6) U12(6.4,2.4) U13(6.4,3.2) U14(6.4,4) U15(6.4,4.8) U16(6.4,5.6) U17(6.4,6.4)
  silkscreen extent -7.16,-7.16 -7.06,-7.06, body extent -7,-7 7,7, height 1.06
TP-1.00MM [mm]
  rrect100% 1x1 smd paste-2.54: X(0,0)
U.FL-R-SMT-1(60)-1 [mm]
  rect 1.05x2.2 smd paste+0: GND(-1.475,0) GND(1.475,0)
  rect 1.05x1 smd paste+0: SIG(0,-1.6)
  body extent -1.5,-1.55 1.5,1.55, height 1.25
UDFN8 [mm] "QFN, 8-Leads, Body 3.00x2.00mm, Pitch 0.50mm, Thermal Pad 1.30x1.50mm, IPC Medium Density"
  rrect54% 0.26x0.64 smd paste+0 mask+0.05: 1(-0.75,-1.345) 2(-0.25,-1.345) 3(0.25,-1.345) 4(0.75,-1.345) 5(0.75,1.345) 6(0.25,1.345) 7(-0.25,1.345) 8(-0.75,1.345)
  rrect8% 1.5x1.3 smd paste-1.5 mask+0.05: 9(0,0)
  silkscreen extent -1.19,-1.83 -1.09,-1.73, body extent -1,-1.5 1,1.5, height 0.55
UHD1110-FKA-CL1A13R3Q1BBQFMF3 [mm]
  rrect25% 0.54x0.54 smd mask+0.05: 1(-0.395,-0.395) 2(0.395,-0.395) 3(0.395,0.395)
  round 0.025 smd mask+0.05: 4(-0.395,0.395)
  Top Layer region: -0.35,0.665 -0.125,0.44 -0.125,0.265 -0.136,0.212 -0.166,0.166 -0.212,0.136 -0.265,0.125 -0.265,0.125 -0.525,0.125 -0.578,0.136 -0.624,0.166 -0.654,0.212 -0.665,0.265 -0.665,0.265 -0.665,0.525 -0.654,0.578 -0.624,0.624 -0.578,0.654 -0.525,0.665 -0.525,0.665
  body extent -0.5,-0.5 0.5,0.5, height 0.63
USB-A-S-RA-CS11-SMT-HF-TR [mm]
  rrect25% 1.45x3 smd paste+0 mask+0.05: 1(-3.5,6) 2(-1,6) 3(1,6) 4(3.5,6)
  oval 1.8x3 hole 0.8 slot 1.6 at 90 deg paste-2539.97 mask+0.05: SHIELD1(-6.525,3.5) SHIELD2(6.525,3.5)
  oval 1.8x4 hole 0.8 slot 2.8 at 90 deg copper offset 0,0.2 paste-2539.97 mask+0.05: SHIELD3(-7.025,-3.4) SHIELD4(7.025,-3.4)
  body extent -7.25,-8.25 7.25,6.42, height 7.72